# Altium PCB EVB-2.PCBDOC (part 1 of 6)
Units mil, origin at the board's own origin, x right, y up, seen from the top; angles counter-clockwise.
Board outline 2401.57 x 1771.65 mil, 6 copper layers (Top, Mid1-H, Mid2-PWR, GND, Mid3-V, Bottom), stack 59.449 mil thick; 172 components, 166 nets, 823 pads, 550 vias.
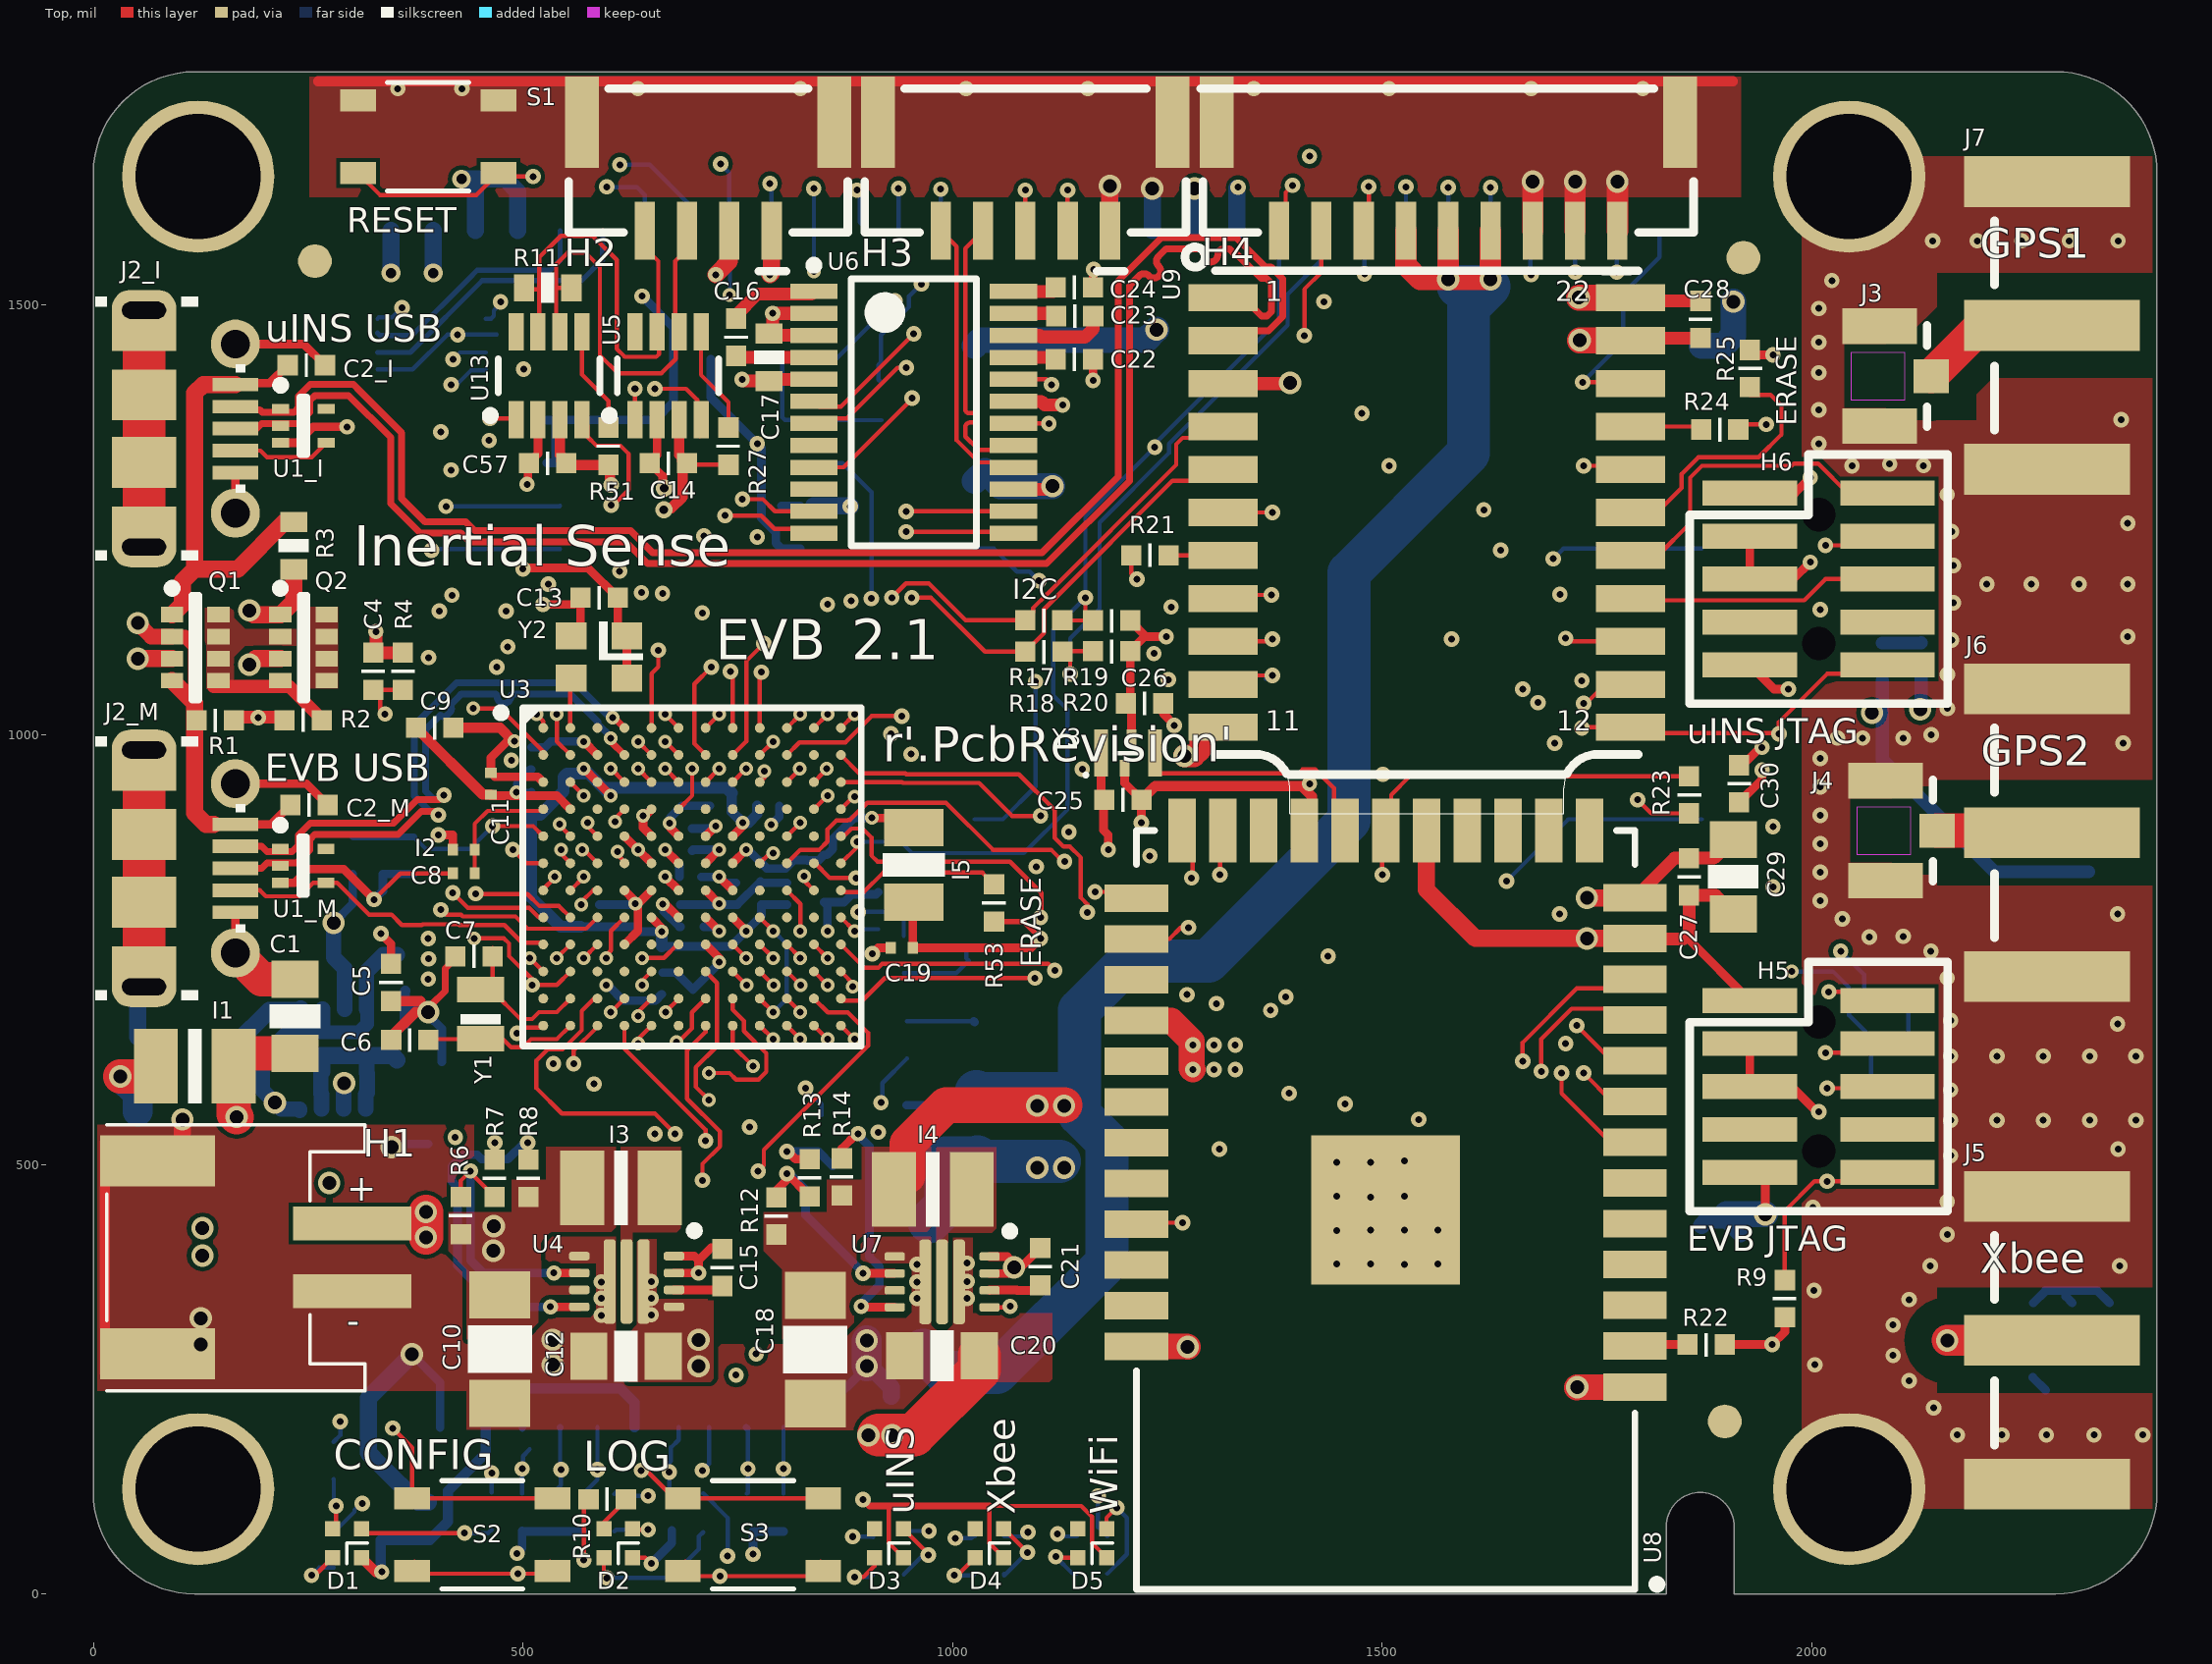
[diagram p0: Top view]
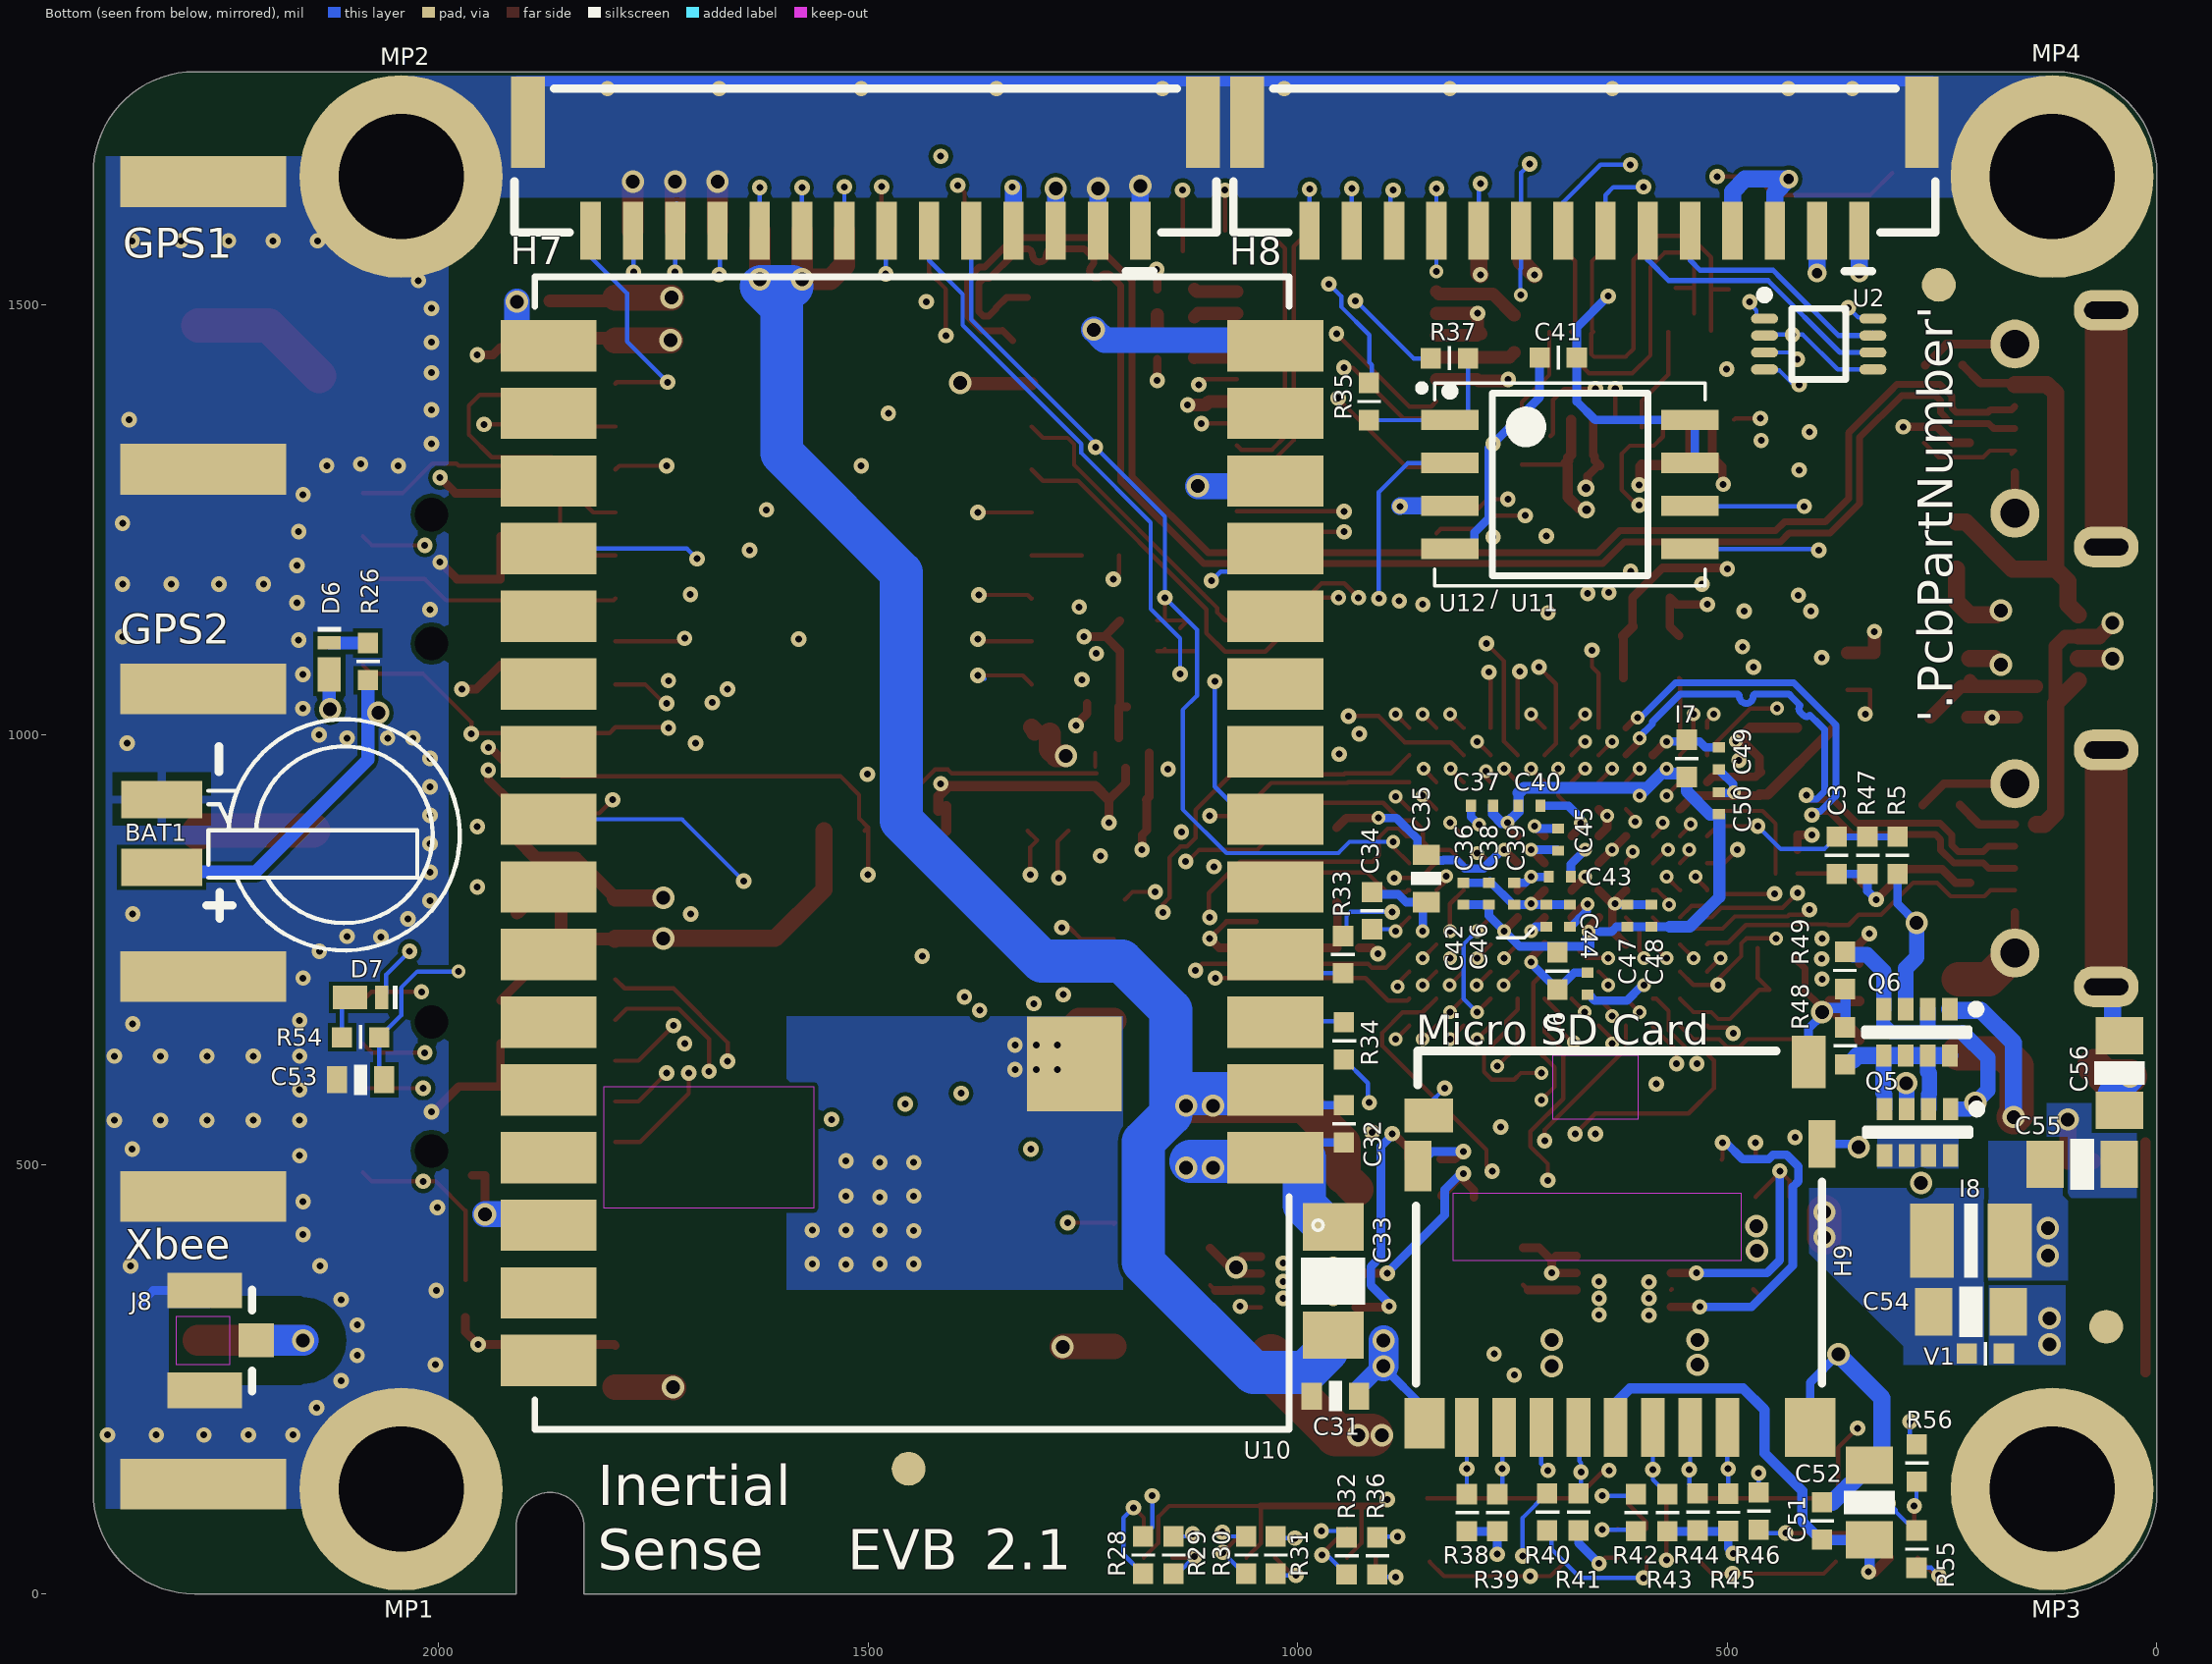
[diagram p1: Bottom view, seen from below]
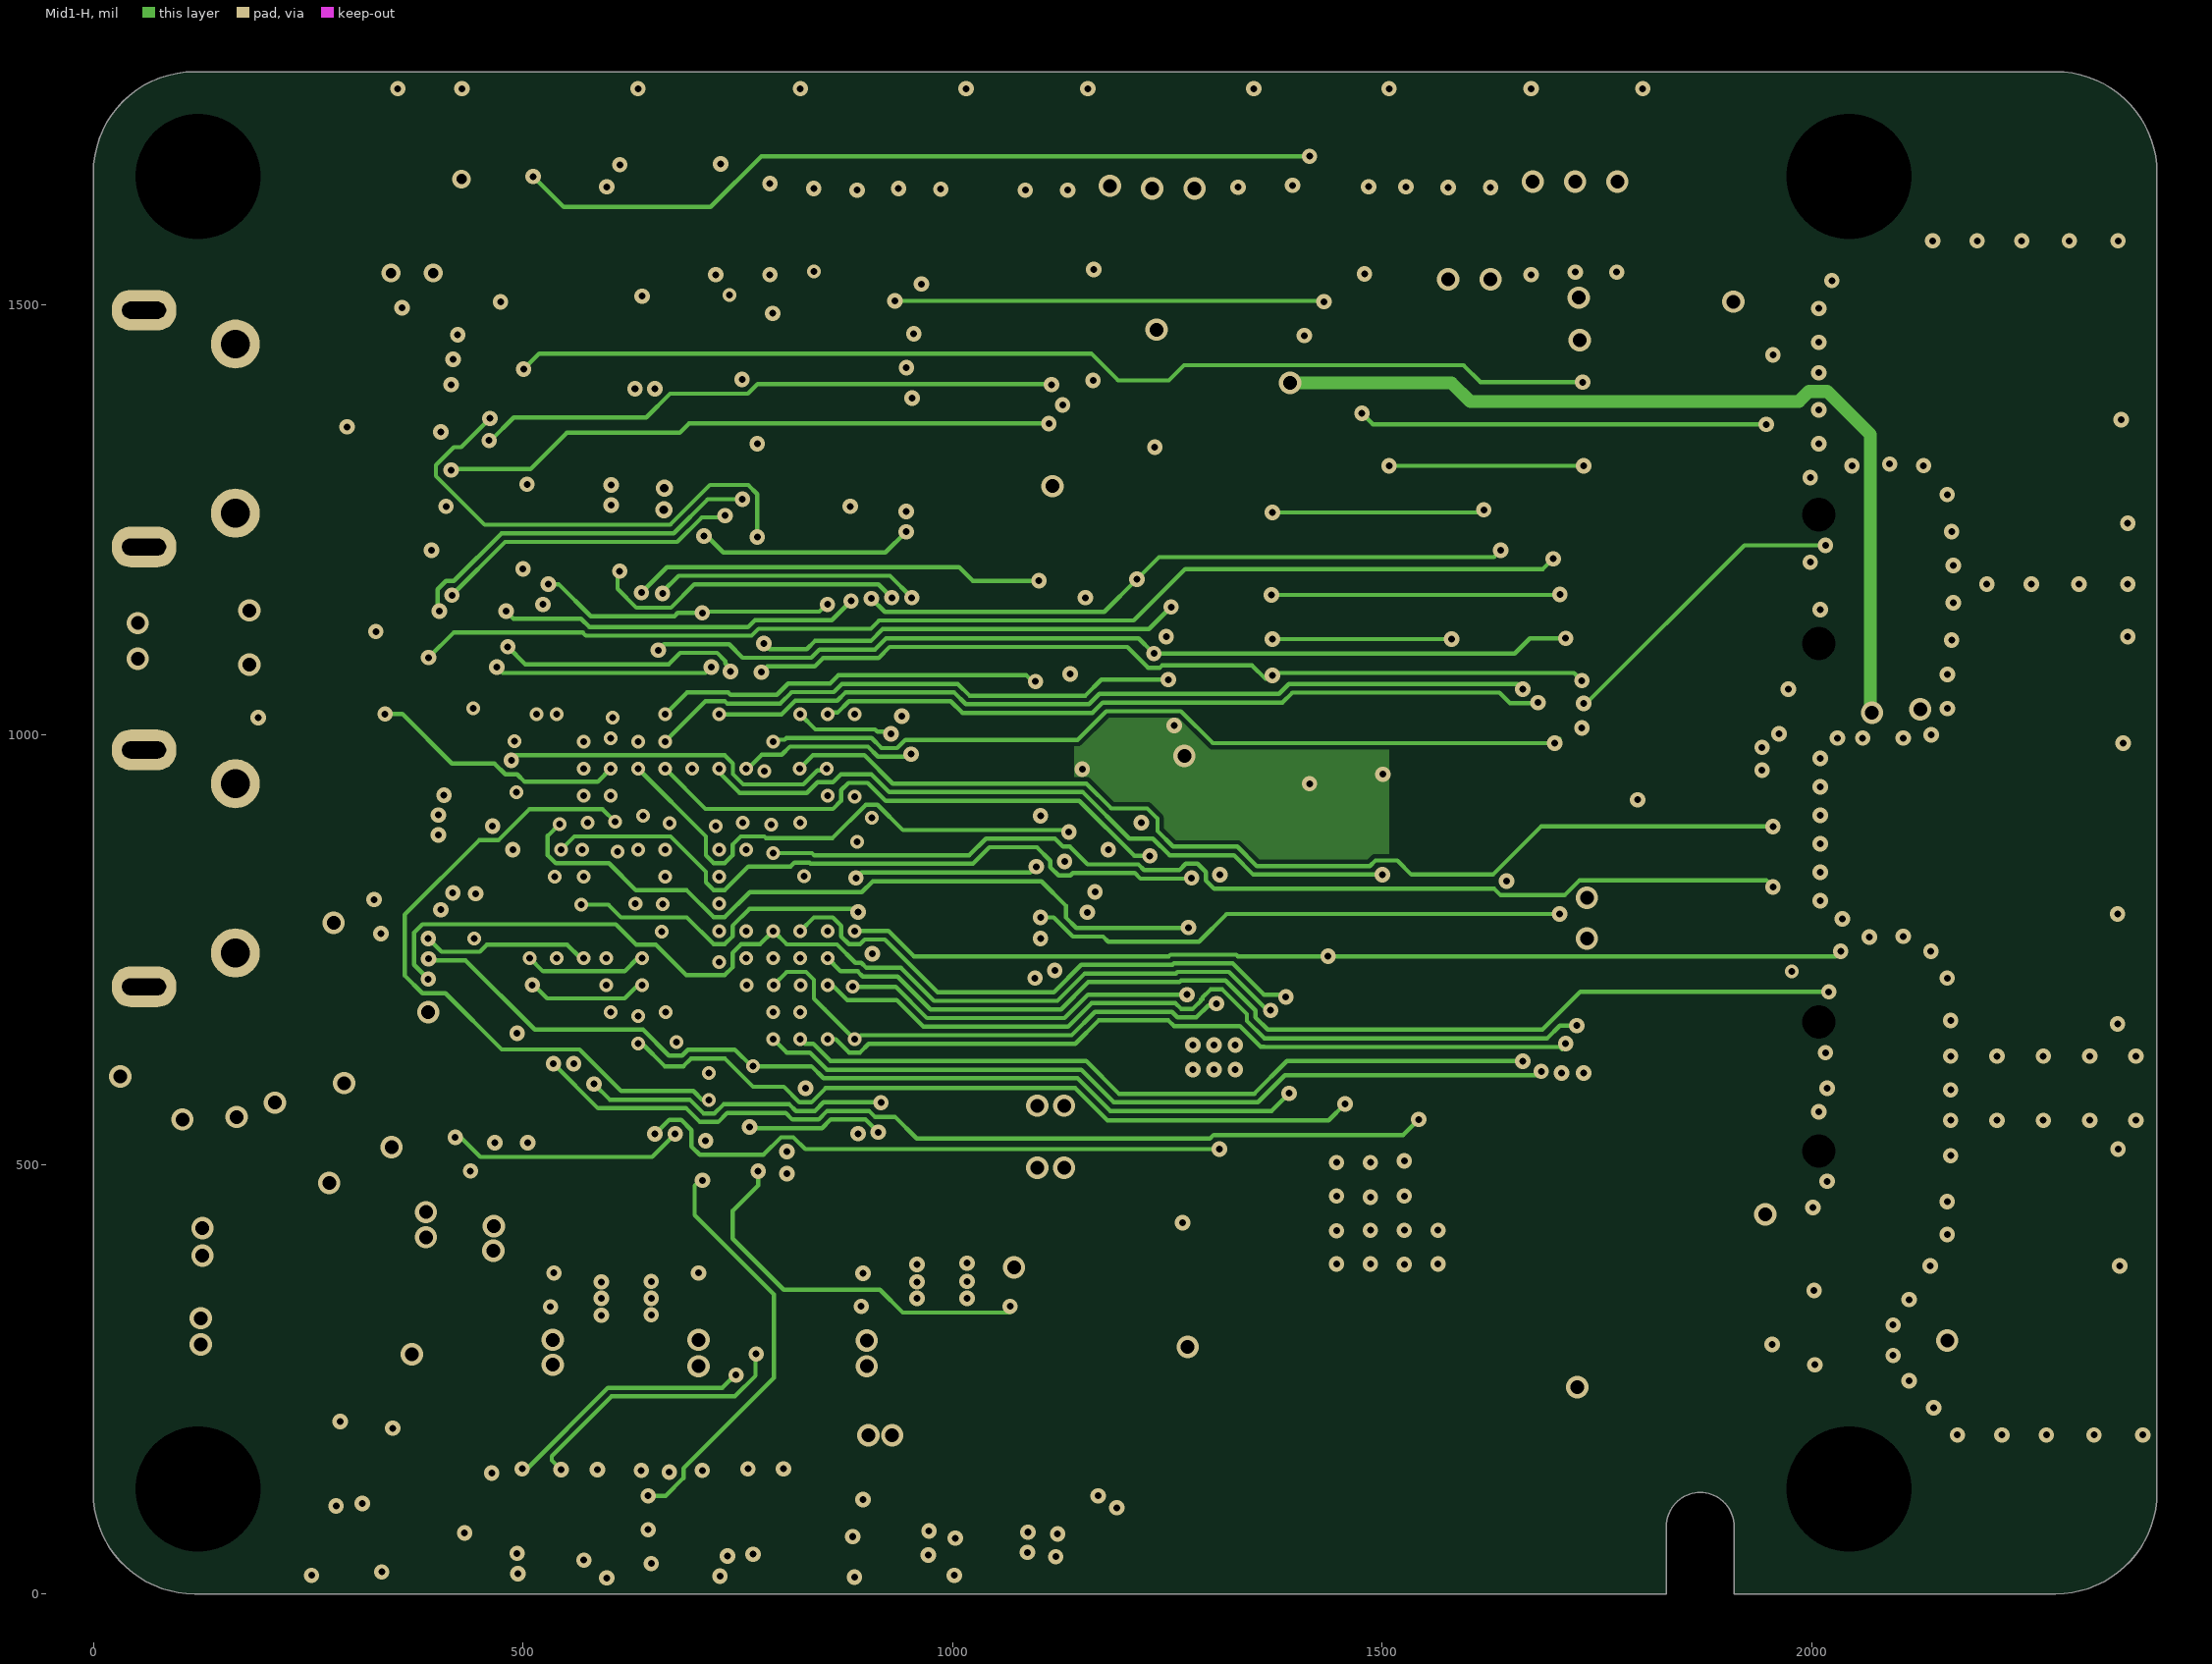
[diagram p2: Mid1-H]
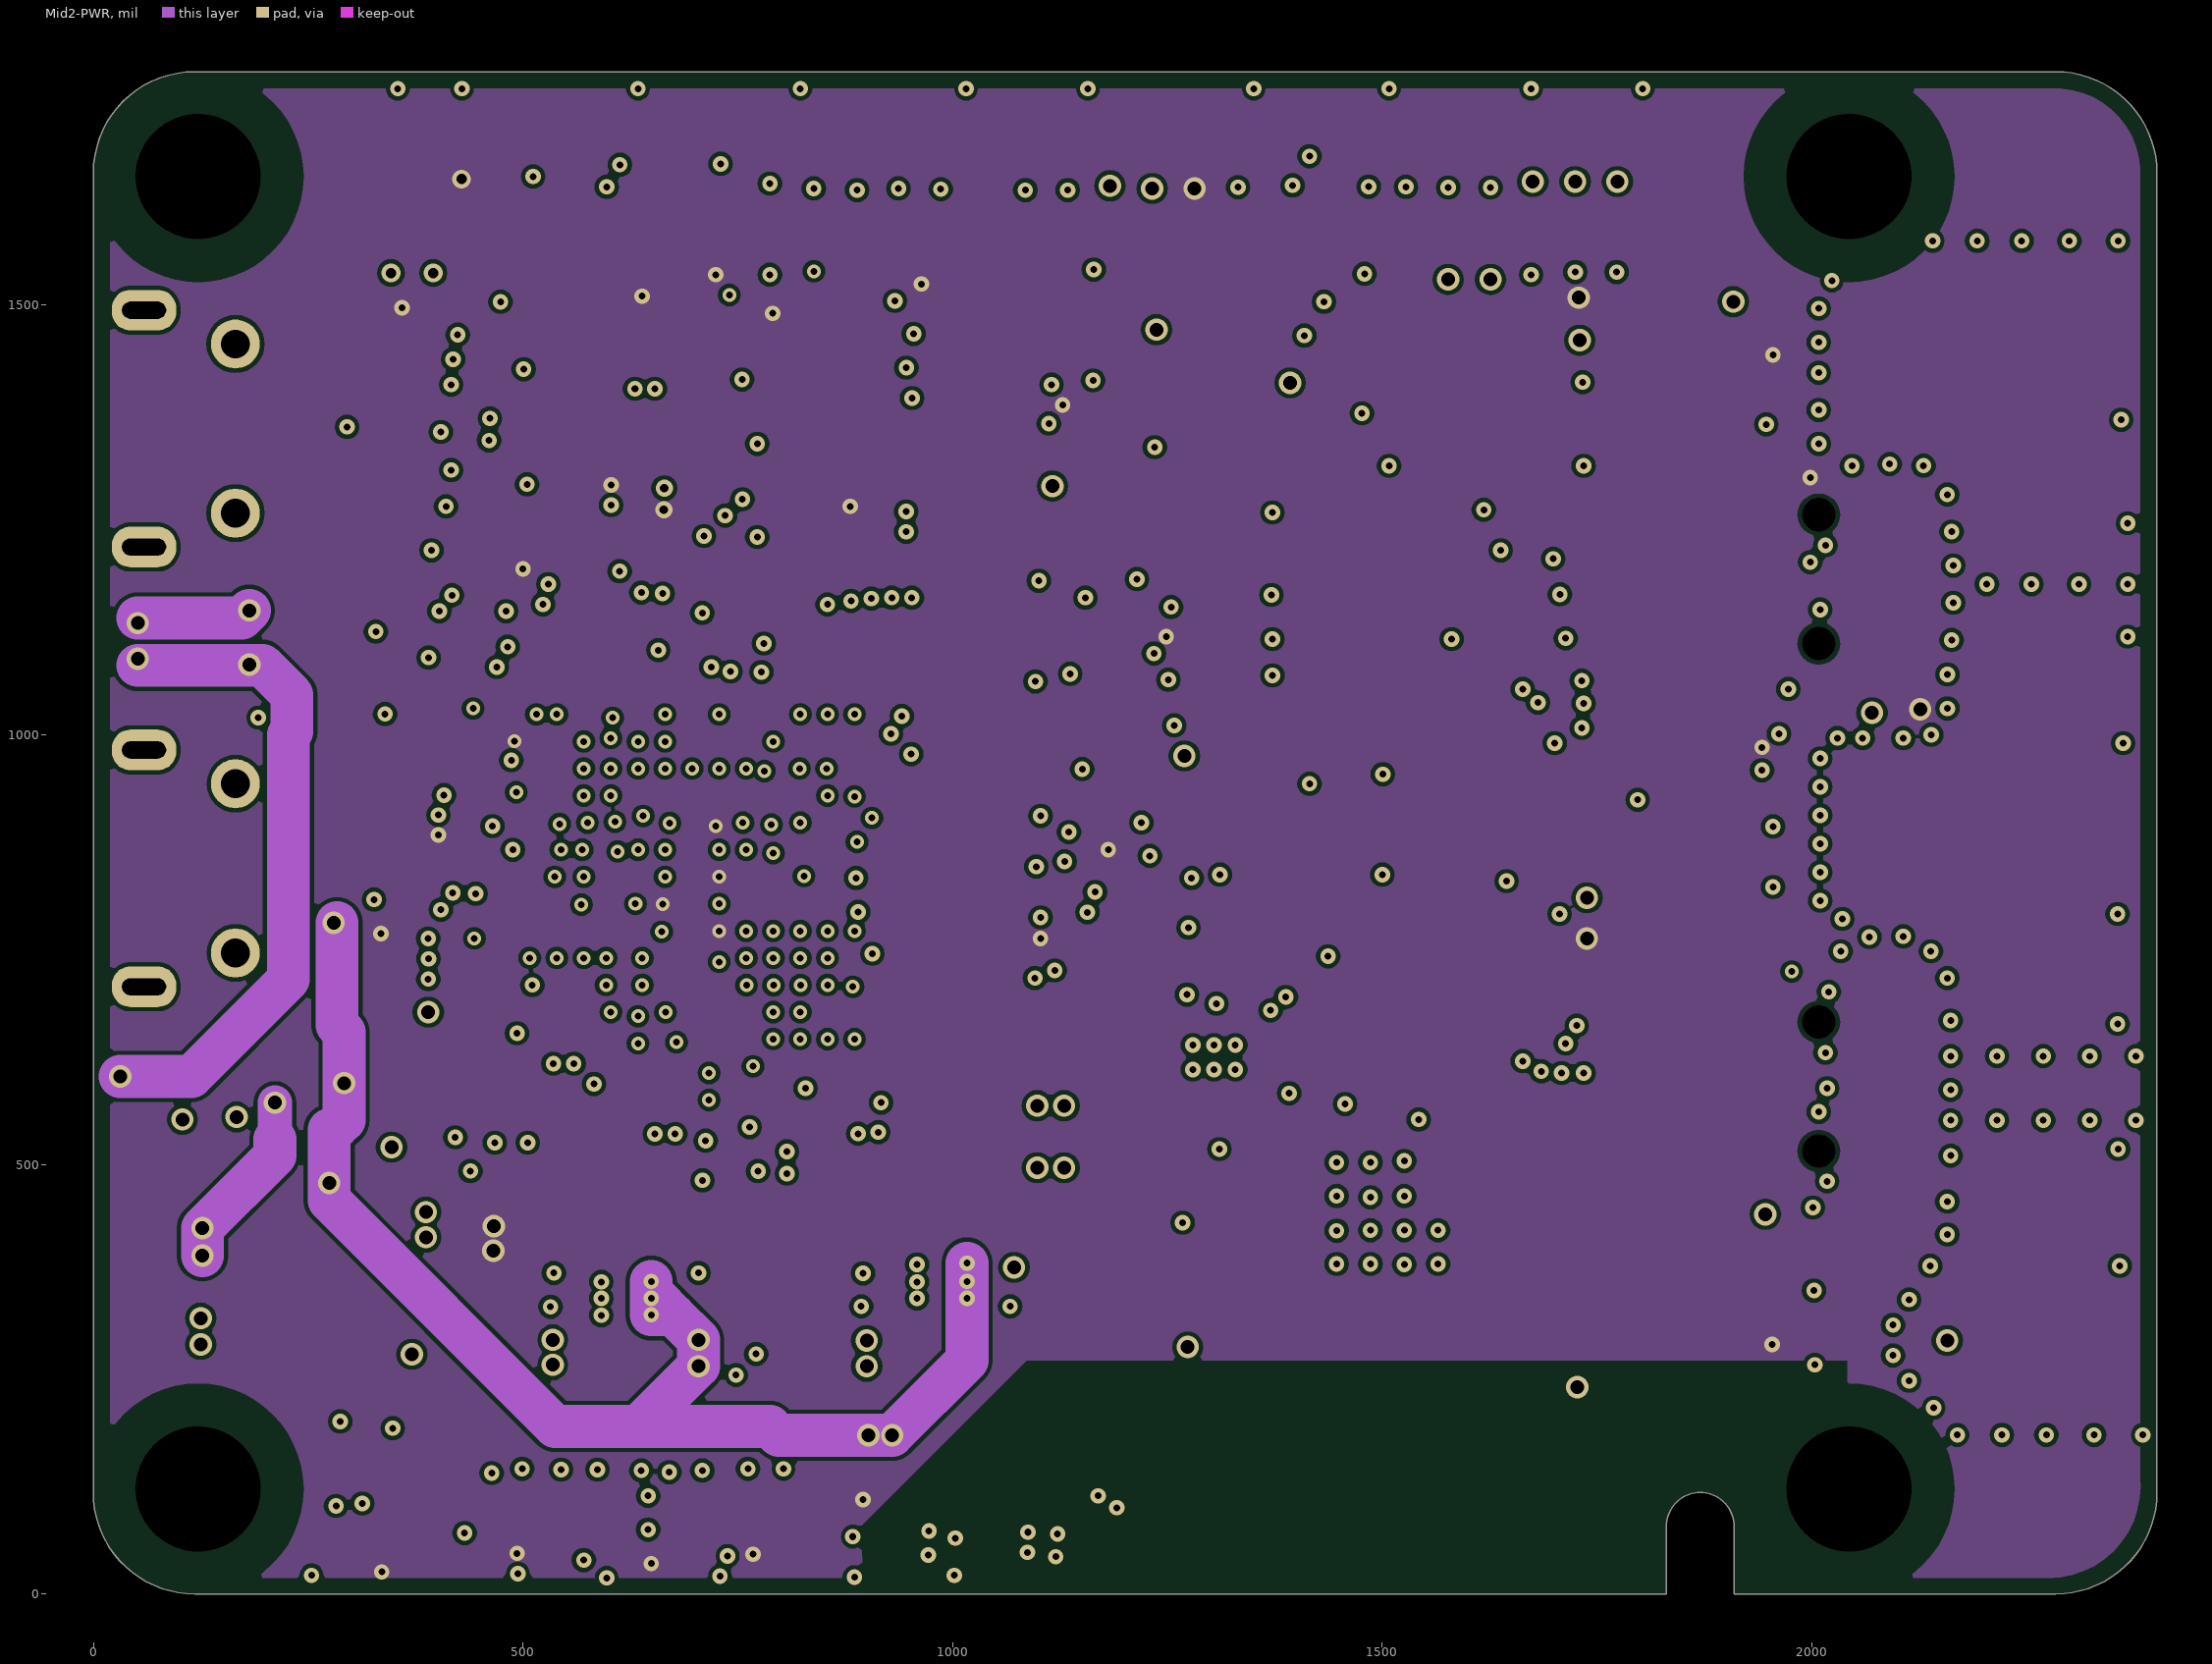
[diagram p3: Mid2-PWR]
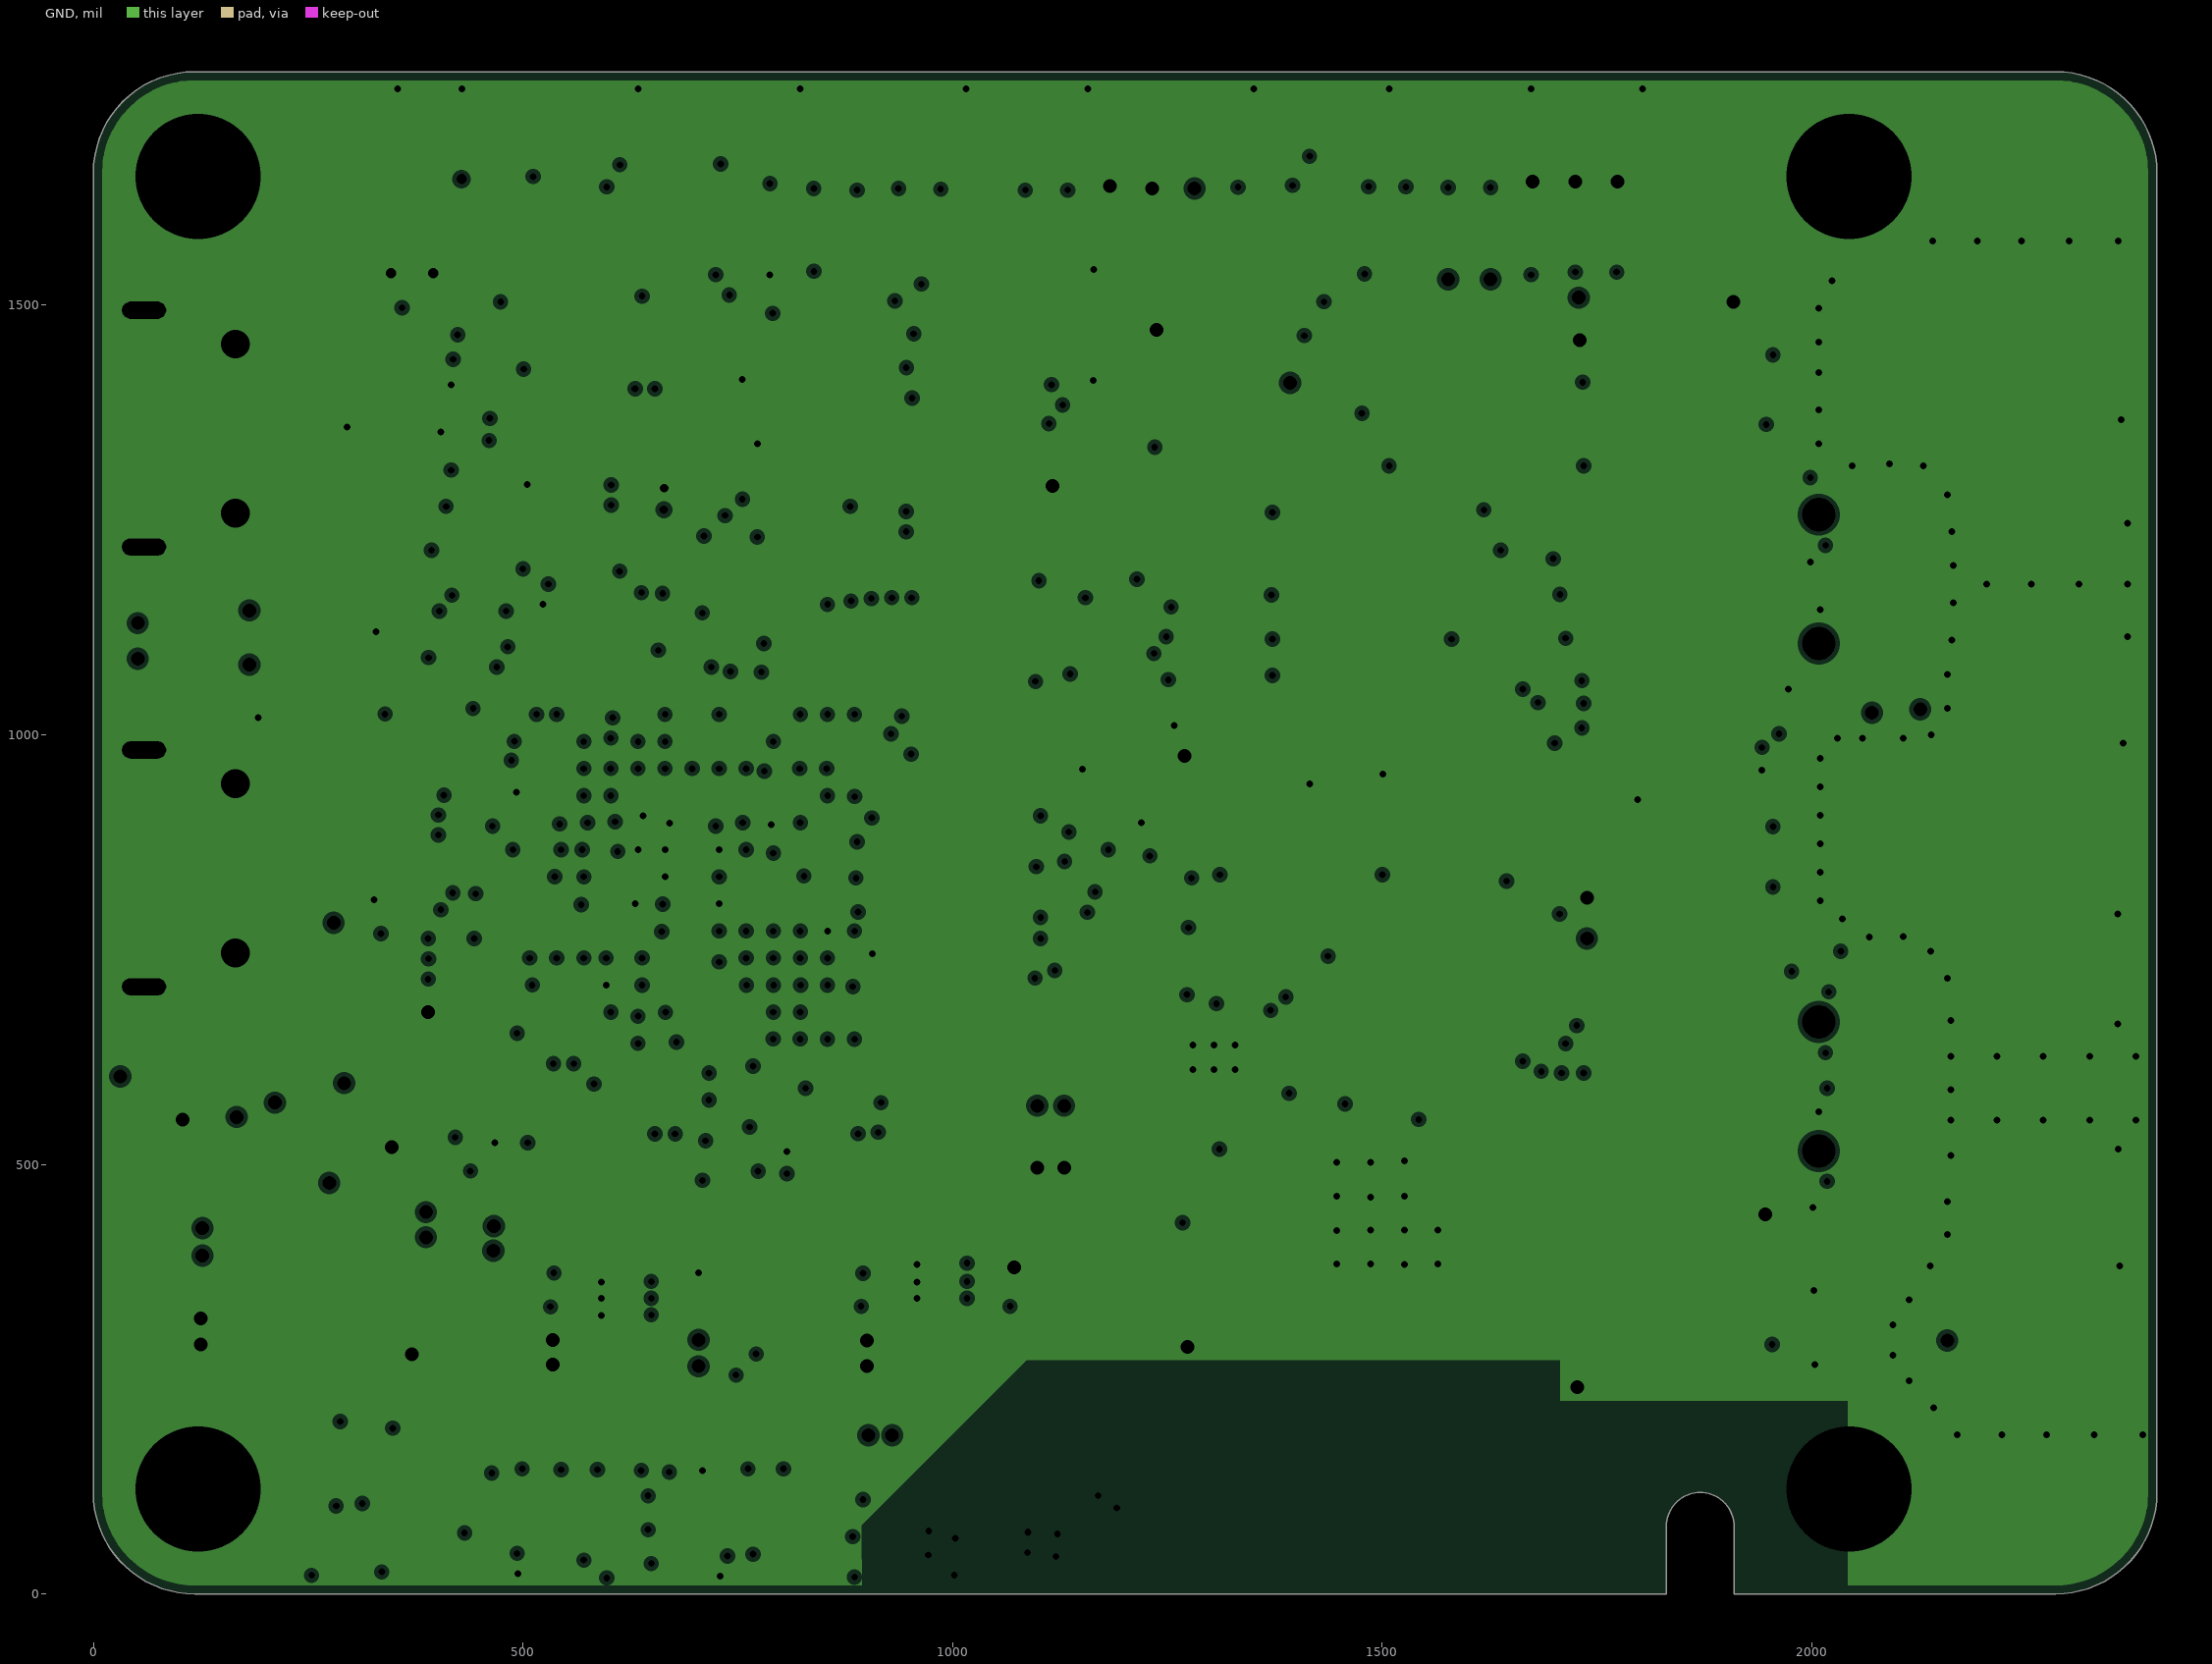
[diagram p4: GND, clearances drawn from the general rule]
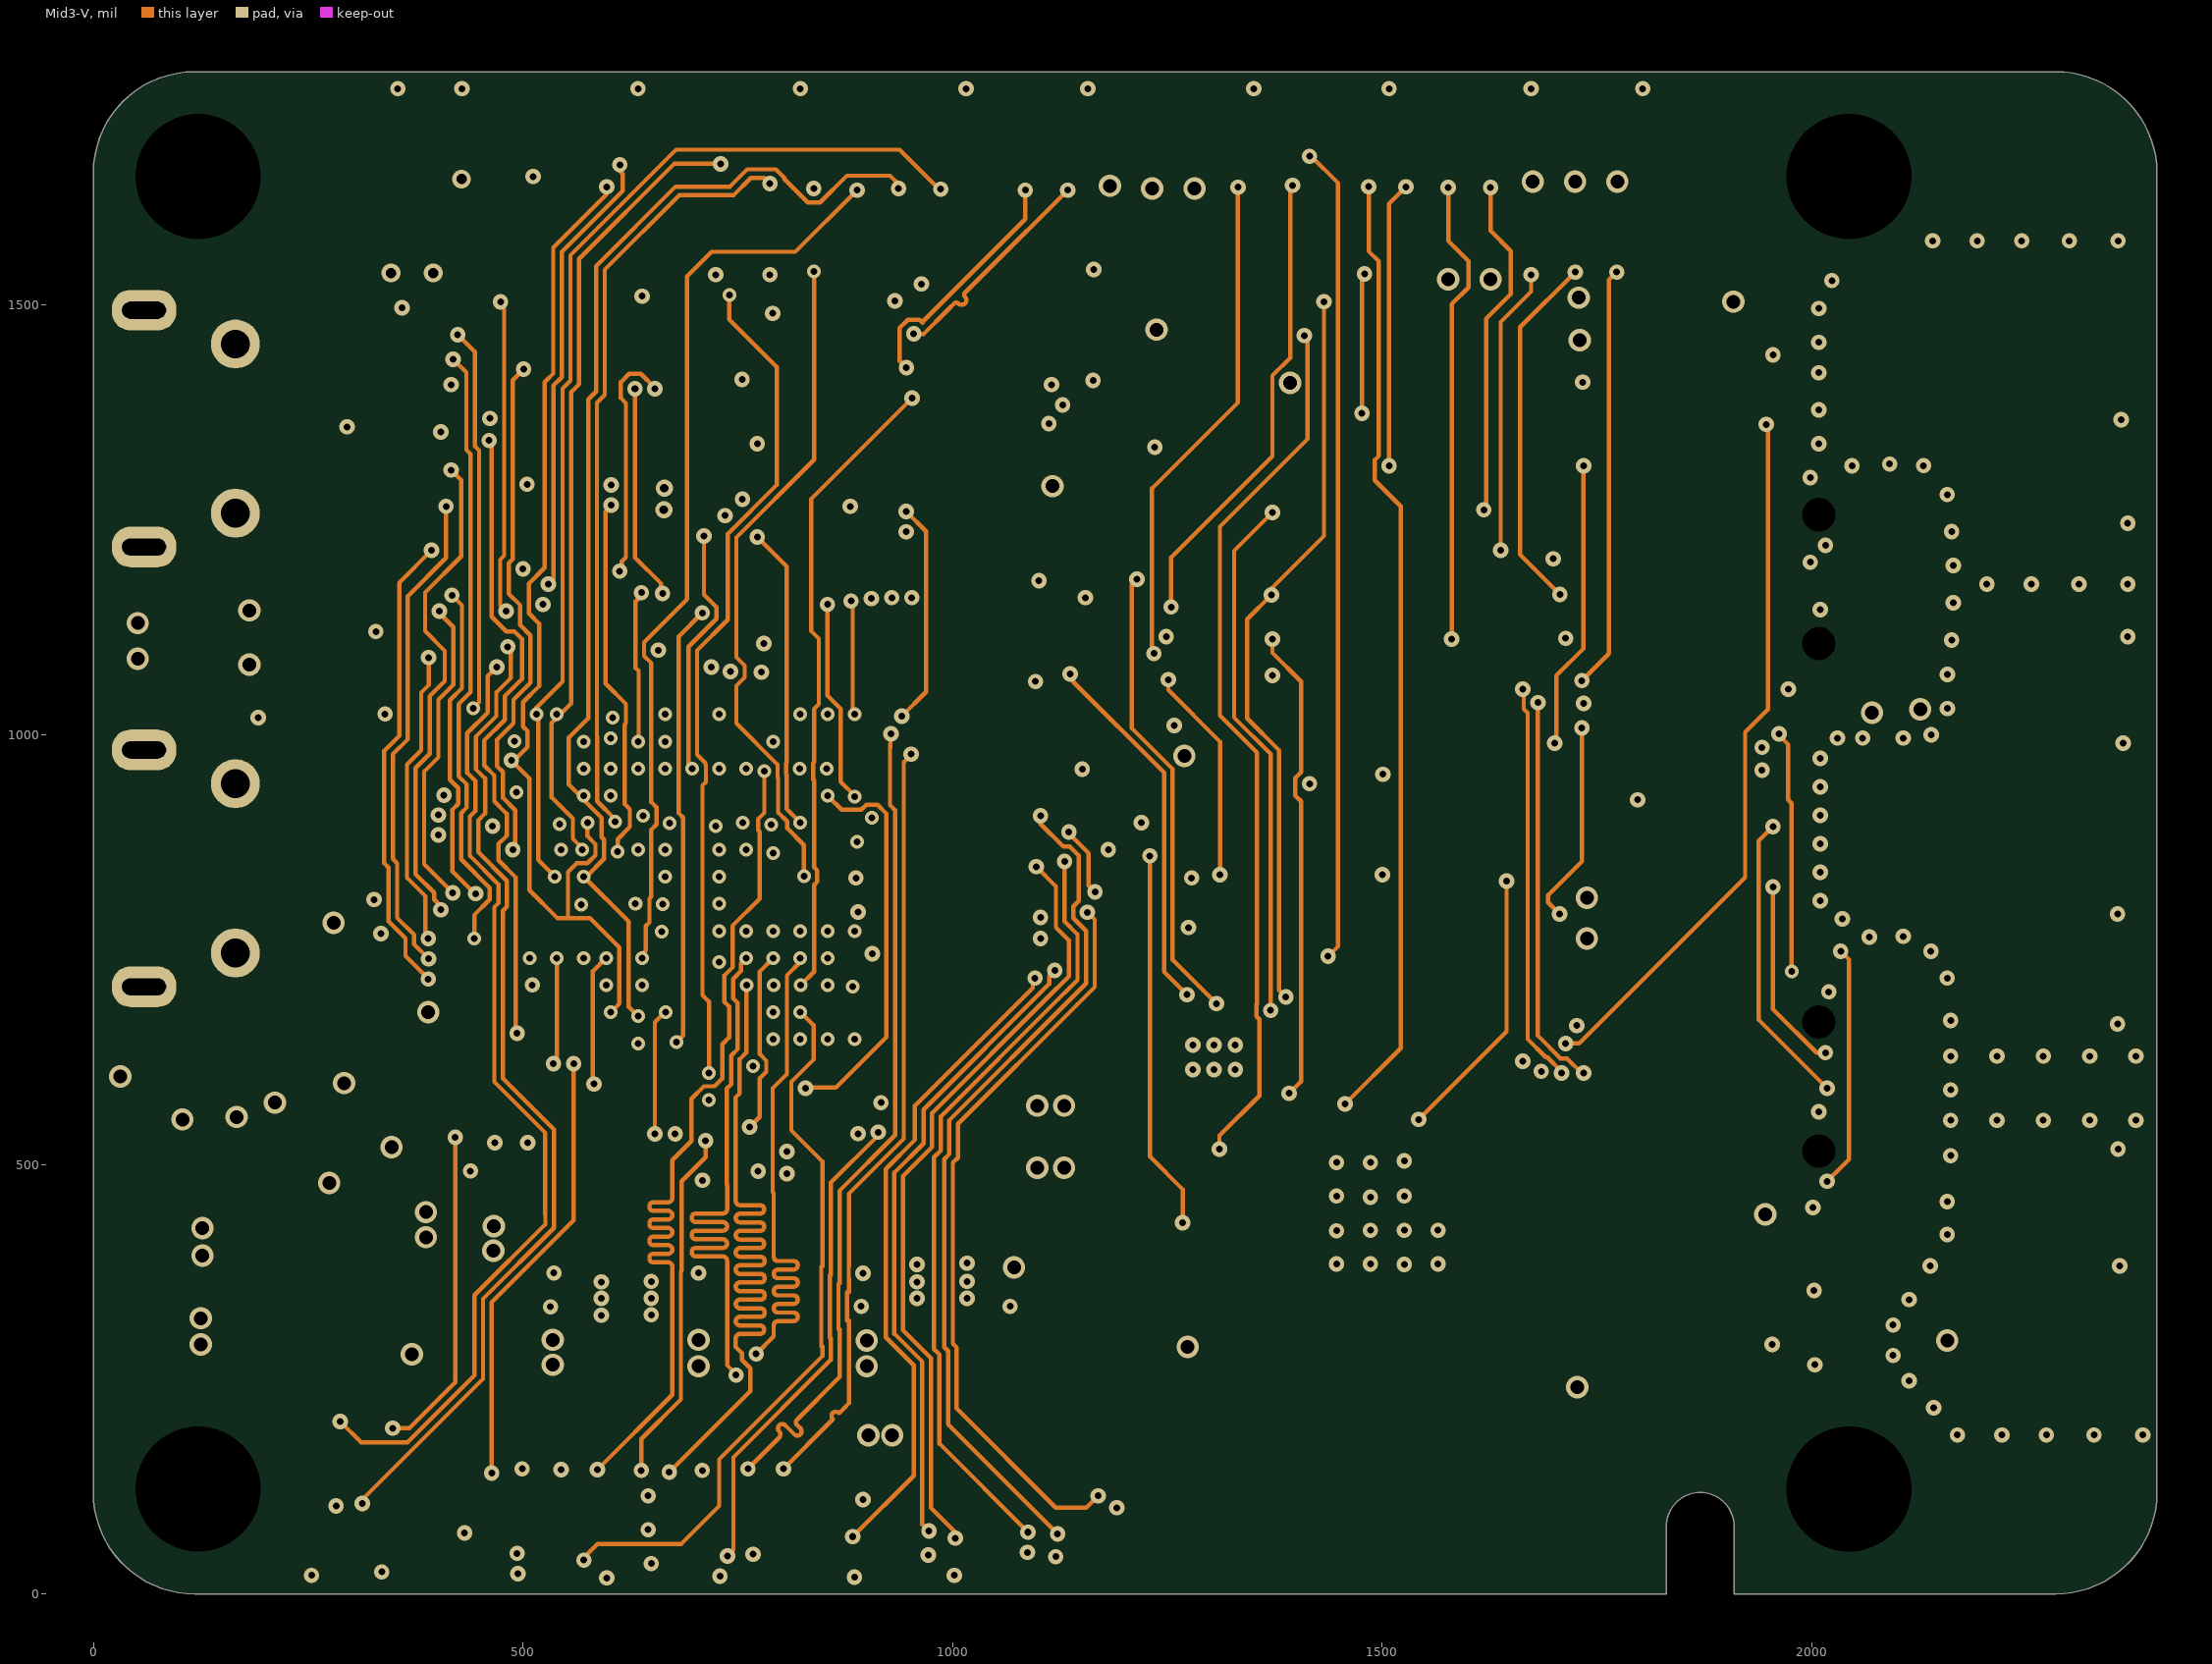
[diagram p5: Mid3-V]
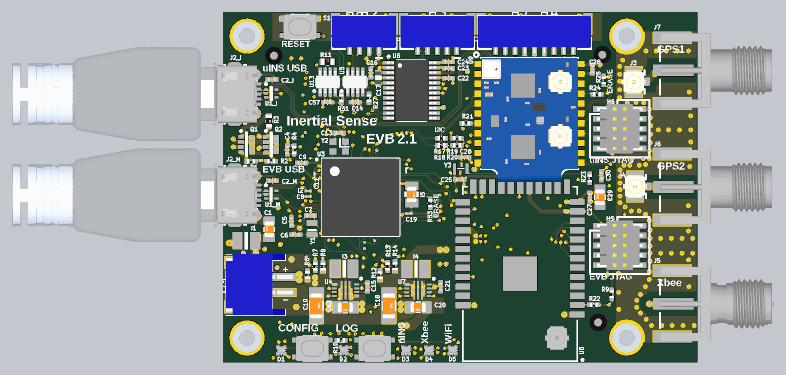
[diagram p9: 3D render of the assembled board from above, using the file's embedded part models]
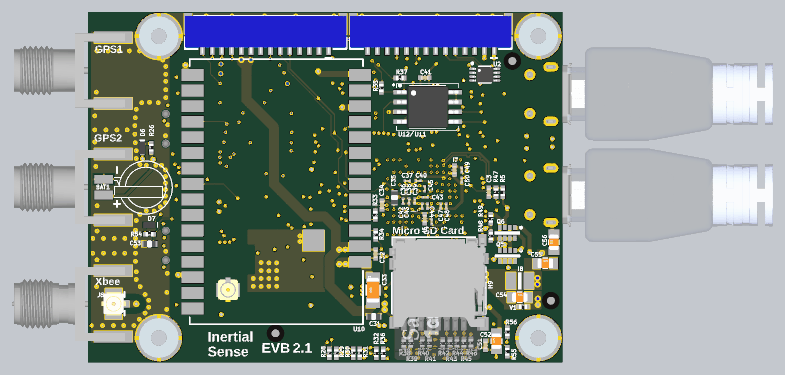
[diagram p10: 3D render of the assembled board from below, using the file's embedded part models]

## Layer stack, top to bottom
Solder Mask Top: solder mask 0.4, Solder Resist, Dk 3.5
Top: signal copper 1.378
Dielectric 4: dielectric 7.874, Dk 4.2
Mid1-H: signal copper 1.378
Dielectric1: core 7.874, FR-4, Dk 4.3
Mid2-PWR: signal copper 1.378
Dielectric3: prepreg 19.685, FR-4, Dk 4.3
GND: plane copper 1.378, net GND
Dielectric 5: core 7.874, Dk 4.2
Mid3-V: signal copper 1.378
Dielectric2: prepreg 7.874, FR-4, Dk 4.2
Bottom: signal copper 1.378
Solder Mask Bottom: solder mask 0.4, Solder Resist, Dk 3.5

## Board outline
1909.45,0 1909.45,78.74 ccw(c1870.09,78.75) 1870.08,118.11 ccw(c1870.06,78.76) 1830.71,78.74 1830.71,0 118.11,0 cw(c118.11,118.11) 0,118.11 0,1653.54 cw(c118.11,1653.54) 118.11,1771.65 2283.46,1771.65 cw(c2283.47,1653.55) 2401.57,1653.54 2401.57,118.11 cw(c2283.48,118.1) 2283.46,0

## Design rules (kind name [scope] priority, off if disabled: settings)
AssemblyTestPointUsage [All] p1 off:
AssemblyTestpoint [All] p1 off: testpointundercomponent=TRUE minsize=40 maxsize=100 preferedsize=60 minholesize=0 maxholesize=40 preferedholesize=32 testpointgrid=1 usegrid=TRUE gridtolerance=0.01 allowsidetop=TRUE allowsidebottom=TRUE
Clearance MountingHoles [(InPadClass('Mounting Holes'))] p1: gap=5 ignorepadtopadclearanceinfootprint=TRUE except(25: THPad-Hole; 50: Arc-Hole Track-Hole SMDPad-Hole Via-Hole Fill-Hole Poly-Hole Region-Hole Text-Hole)
Clearance "Clearance - GPS Ant" [InNetClass('RF_GPS') vs InNet('GND')] p2: gap=8 ignorepadtopadclearanceinfootprint=FALSE except(32: Arc-Fill Arc-Poly Arc-Region Track-Fill Track-Poly Track-Region SMDPad-Fill SMDPad-Poly SMDPad-Region THPad-Fill THPad-Poly THPad-Region Via-Fill Via-Poly Via-Region Fill-Fill Fill-Poly Fill-Region Poly-Poly Poly-Region Region-Region)
Clearance [All] p3: gap=5 ignorepadtopadclearanceinfootprint=FALSE
ComponentClearance Ignore [InComponent('H7')] p1: gap=-500 collisioncheckmode=3 verticalgap=-500 showdistances=FALSE
ComponentClearance HeaderClearance [InComponent('H1')] p2: gap=10 collisioncheckmode=3 verticalgap=-10 showdistances=FALSE
ComponentClearance Default [All] p3: gap=10 collisioncheckmode=3 verticalgap=10 showdistances=FALSE
DiffPairsRouting CAN [InDifferentialPairClass('CAN')] p1: maxlimit=14 minlimit=10 mostfreqgap=14 toplayer_prefgap=10 toplayer_minwidth=5 toplayer_maxwidth=6 toplayer_prefwidth=5 midlayer1_mingap=14 midlayer1_minwidth=4 midlayer1_maxwidth=6 midlayer1_prefwidth=4 midlayer2_mingap=14 midlayer2_minwidth=4 midlayer2_maxwidth=6 midlayer2_prefwidth=4 midlayer3_mingap=14 midlayer3_minwidth=4 midlayer3_maxwidth=6 midlayer3_prefwidth=4 bottomlayer_prefgap=10 bottomlayer_minwidth=5 bottomlayer_maxwidth=6 bottomlayer_prefwidth=5 maxuncoupledlength=500
DiffPairsRouting USB [InDifferentialPairClass('USB')] p2: maxlimit=5 minlimit=5 mostfreqgap=5 toplayer_minwidth=8 toplayer_maxwidth=8 toplayer_prefwidth=8 midlayer1_minwidth=8 midlayer1_maxwidth=8 midlayer1_prefwidth=8 midlayer2_minwidth=8 midlayer2_maxwidth=8 midlayer2_prefwidth=8 midlayer3_minwidth=8 midlayer3_maxwidth=8 midlayer3_prefwidth=8 bottomlayer_minwidth=8 bottomlayer_maxwidth=8 bottomlayer_prefwidth=8 maxuncoupledlength=500
DiffPairsRouting [All] p3: maxlimit=8 minlimit=8 mostfreqgap=8 toplayer_minwidth=8 toplayer_maxwidth=15 toplayer_prefwidth=15 midlayer1_minwidth=8 midlayer1_maxwidth=15 midlayer1_prefwidth=15 midlayer2_minwidth=8 midlayer2_maxwidth=15 midlayer2_prefwidth=15 midlayer3_minwidth=8 midlayer3_maxwidth=15 midlayer3_prefwidth=15 bottomlayer_minwidth=8 bottomlayer_maxwidth=15 bottomlayer_prefwidth=15 maxuncoupledlength=500
FabricationTestPointUsage [All] p1 off: valid=0 allowmultiple=FALSE
FabricationTestpoint [All] p1 off: side=3 testpointundercomponent=TRUE minsize=40 maxsize=100 preferedsize=60 minholesize=0 maxholesize=40 preferedholesize=32 testpointgrid=1 allowsidetop=TRUE allowsidebottom=TRUE usegrid=TRUE gridtolerance=0.01
HoleSize [All] p1: absolutevalues=TRUE maxlimit=200 minlimit=8 maxpercent=80.000 minpercent=20.000
HoleToHoleClearance [All] p1: gap=9 allowstackedmicrovias=TRUE
MatchedLengths MatchedLengths_HDMI [InDifferentialPairClass('HDMI')] p1: tolerance=5 checknetsindiffpair=TRUE checkdiffpairvsdiffpair=FALSE checkxsignals=FALSE checkothers=FALSE
MaxMinImpedance [InDifferentialPairClass('HDMI')] p1: minimum=10.00 maximum=110.0
MinimumAnnularRing [All] p1: minimumring=4
MinimumSolderMaskSliver MinimumSolderMaskSliver_Tight [HasFootprint('QFN40P300X300X105_HS-25L') OR HasFootprint('R0201x4') OR HasFootprint('R0201x2') OR HasFootprint('QFN50P300X200X60_HS-9L') OR HasFootprint('TSST8') OR HasFootprint('SOT23-8-65P280X145-8N') OR HasFootprint('TSOP65P640X120-24N') OR HasFootprint('SOTFL50P160X60-5N')] p1: minsoldermaskwidth=1
MinimumSolderMaskSliver [All] p2: minsoldermaskwidth=3
PlaneClearance [All] p1: clearance=5
PlaneConnect "Power Plane Connect Style" [All] p1: planeconnectstyle=Direct reliefexpansion=20 reliefentries=4 reliefconductorwidth=7 reliefairgap=10
PolygonConnect "Direct Connect" [InPolygonClass('NO THERMALS')] p1: connectstyle=Direct reliefconductorwidth=10 reliefentries=4 polygonreliefangle="90 Angle" airgapwidth=10
PolygonConnect "GND Vias" [InNet('GND') AND IsVia] p2: connectstyle=Direct reliefconductorwidth=10 reliefentries=4 polygonreliefangle="90 Angle" airgapwidth=10
PolygonConnect "Default Polygon Connect" [All] p3: connectstyle=Relief reliefconductorwidth=10 reliefentries=4 polygonreliefangle="90 Angle" airgapwidth=10
RoutingCorners "Routing Corners Default" [All] p1: cornerstyle=45-Degree minsetback=100 maxsetback=100
RoutingLayers "Routing Layers Default" [All] p1: top layer_v5=TRUE mid layer 1_v5=TRUE mid layer 2_v5=TRUE mid layer 3_v5=TRUE bottom layer_v5=TRUE
RoutingPriority "Routing Priority Default" [All] p1: routingpriority=0
RoutingVias "Via Style Default" [All] p1: holewidth=8 width=18 viastyle="Through Hole" minholewidth=8 minwidth=16 maxholewidth=25 maxwidth=35
SilkToBoardRegionClearance [All] p1 off:
SilkToSilkClearance [Not ( ((ObjectKind = 'Text') And ((UseInvertedRectangle = 'True') OR (IsTextInverted = 'True'))) OR (ObjectKind = 'Fill') ) vs Not ( ((ObjectKind = 'Text') And ((UseInvertedRectangle = 'True') OR (IsTextInverted = 'True'))) OR (ObjectKind = 'Fill') )] p1: silktosilkclearance=3
SilkToSolderMaskClearance SilkscreenOverComponentPads [NOT(IsPad AND OnLayer('Multi-Layer'))] p1: minsilkscreentomaskgap=0 clearancetoexposedcopper=TRUE
SolderMaskExpansion Tented [IsVia AND (InNet('VIN') OR InNet('VINP') OR InNet('+3.3V'))] p1: expansion=-30 istentingtop=FALSE
SolderMaskExpansion "SolderMaskExpansion GND Vias" [IsVia AND InNet('GND')] p2: expansion=-30 istentingtop=FALSE
SolderMaskExpansion "SolderMaskExpansion Vias" [IsVia] p3: expansion=-30 istentingtop=FALSE
SolderMaskExpansion "Solder Mask Expansion" [All] p4: expansion=3 istentingtop=FALSE
Width "RF GPS" [InNetClass('RF_GPS')] p1: maxlimit=40 minlimit=10 preferedwidth=14
Width "Width Default" [All] p2: maxlimit=150 minlimit=3 preferedwidth=5
13 further rules are at their usual default settings.

## Classes and differential pairs
net class "Mounting Holes": GND
net class SD_BUS: SD.CLK SD.CMD SD.D0 SD.D1 SD.D2 SD.D3
channel class CON-USB: I M
component class M: C2_M J2_M U1_M
component class I: C2_I J2_I U1_I
differential pair class USB: I-USB.D M-USB.D
component class U_SD-Card: C51 C52 H9 R38 R39 R41 R43 R44 R45
component class U_SAM70: C4 C5 C6 C7 C8 C9 C11 C13 C19 C26 C30 C34 C35 C36 C37 C38 C39 C40 C42 C43 C44 C45 C46 C47 C48 C49 C50 C53 D1 D2 D3 D4 D5 D7 H4 H5 H8 I2 I5 I6 I7 R4 R9 R10 R28 R29 R30 R31 R32 R36 R40 R42 R46 R53 R54 R55 R56 S1 S2 S3 U2 U3 Y1 Y2
component class U_RS232-485: C16 C17 C22 C23 C24 H3 U6
component class U_RF: J3 J4 J5 J6 J7 J8
differential pair class CAN: CAN.D
component class U_WiFi: C25 C27 C29 R22 R23 U8 Y3
component class U_CAN: C14 C57 H2 R11 R27 R51 U5 U13
net class RF_GPS: BEE_ANT GPS1_ANT GPS2_ANT
polygon class "NO THERMALS": Inner-INS.3V3 REG RF_BOT
pad class "Mounting Holes": MP1-1 MP2-1 MP3-1 MP4-1
differential pair M-USB.D: +M-USB.D_P -M-USB.D_N
differential pair I-USB.D: +I-USB.D_P -I-USB.D_N
differential pair CAN.D: +CAN.D_P -CAN.D_N

## Components (designator, comment, footprint, x,y, rotation, side; value= is the part's Value field where it differs from the comment)
BAT1 "Battery" ML614S 2322.05,885 r270 bottom locked
C1 "Cap" 0805 234.74,672.28 r90 top value=10uF
C2_I "Cap" 0402 247.89,1430.12 r0 top value=0.1uF (schematic designator C2)
C2_M "Cap" 0402 250.98,918.17 r0 top value=0.1uF (schematic designator C2)
C3 "Cap" 0402 372.85,859.58 r270 bottom value=220nF
C4 "Cap" 0402 325.79,1073.82 r90 top value=10pF
C5 "Cap" 0402 346.46,711.61 r90 top value=0.1uF
C6 "Cap" 0402 368.29,644.68 r180 top value=15pF
C7 "Cap" 0402 442.91,742.13 r180 top value=15pF
C8 "Cap" 0201 431.1,838.58 r180 top value=0.1uF
C9 "Cap" 0402 397.32,1008.09 r0 top value=0.1uF
C10 "Cap" 1206 473.05,284.94 r270 top value=22uF
C11 "Cap" 0201 462.6,942.91 r270 top value=0.1uF
C12 "Cap" 0805 620,276.67 r180 top value=10uF
C13 "Cap" 0402 588.58,1159.45 r0 top value=0.1uF
C14 "Cap" 0402 669.29,1315.94 r0 top value=0.1uF
C15 "Cap" 0402 731.9,380 r90 top value=3300pF
C16 "Cap" 0402 748.03,1462.6 r90 top value=0.1uF
C17 "Cap" 0603 786.42,1439.18 r270 top value=1uF
C18 "Cap" 1206 840.17,284.45 r270 top value=22uF
C19 "Cap" 0201 940.94,751.97 r180 top value=0.1uF
C20 "Cap" 0805 987.81,277.33 r180 top value=10uF
C21 "Cap" 0402 1101.98,380.91 r90 top value=3300pF
C22 "Cap" 0402 1141.73,1437.01 r180 top value=0.1uF
C23 "Cap" 0402 1142.02,1487.2 r180 top value=0.1uF
C24 "Cap" 0402 1141.73,1520.67 r180 top value=0.1uF
C25 "Cap" 0402 1198.15,924.21 r180 top value=0.1uF
C26 "Cap" 0402 1223.41,1036.42 r180 top value=0.1uF
C27 "Cap" 0402 1857.05,834.65 r270 top value=0.1uF
C28 "Cap" 0402 1870.39,1483.27 r90 top value=0.1uF
C29 "Cap" 0805 1908.46,834.64 r90 top value=10uF
C30 "Cap" 0402 1915.35,942.91 r90 top value=0.1uF
C31 "Cap" 0603 956.06,230.32 r180 bottom value=1uF
C32 "Cap" 0402 946.17,547.24 r270 bottom value=0.1uF
C33 "Cap" 1206 958.66,364.17 r90 bottom value=22uF
C34 "Cap" 0402 913.38,795.28 r90 bottom value=47nF
C35 "Cap" 0603 850.39,832.68 r270 bottom
C36 "Cap" 0201 807.09,814.96 r90 bottom value=0.1uF
C37 "Cap" 0201 785.43,917.32 r0 bottom value=0.1uF
C38 "Cap" 0201 777.56,814.96 r90 bottom value=0.1uF
C39 "Cap" 0201 748.03,814.96 r270 bottom value=0.1uF
C40 "Cap" 0201 730.31,917.32 r180 bottom value=0.1uF
C41 "Cap" 0402 696.85,1438.98 r180 bottom value=0.1uF
C42 "Cap" 0201 710.63,789.37 r90 bottom value=0.1uF
C43 "Cap" 0201 694.88,834.65 r180 bottom value=0.1uF
C44 "Cap" 0201 662.64,710.37 r270 bottom value=0.1uF
C45 "Cap" 0201 696.85,877.95 r270 bottom value=0.1uF
C46 "Cap" 0201 683.07,789.37 r90 bottom value=0.1uF
C47 "Cap" 0201 616.14,789.37 r90 bottom value=0.1uF
C48 "Cap" 0201 588.58,789.37 r90 bottom value=0.1uF
C49 "Cap" 0201 509.84,972.44 r270 bottom value=0.1uF
C50 "Cap" 0201 509.84,920.28 r90 bottom value=0.1uF
C51 "Cap" 0402 389.76,85 r270 bottom value=0.1uF
C52 "Cap" 0805 334.65,106.3 r90 bottom value=10uF
C53 "Cap" 0603 2090.55,598.43 r0 bottom
C54 "Cap" 0805 216.54,328.25 r180 bottom value=10uF
C55 "Cap" 0805 87.05,500 r180 bottom value=10uF
C56 "Cap" 0805 43.74,606.3 r90 bottom value=10uF
C57 "Cap" 0402 528.68,1315.94 r0 top value=0.1uF
D1 "LED-RGB" LED0404 295.28,59.06 r270 top
D2 "LED-RGB" LED0404 610.84,59.06 r270 top
D3 "LED-RGB" LED0404 925.9,59.05 r270 top
D4 "LED-RGB" LED0404 1042.93,59.05 r270 top
D5 "LED-RGB" LED0404 1162.4,59.06 r270 top
D6 "Diode - Schottky" D0603B 2127.05,1082.41 r270 bottom
D7 "Diode - Schottky" D0603B 2090.55,694.15 r0 bottom
H1 "Hdr - 2pin - mount" S2B-PH-SM4-TB(LF)(SN) 15.75,391.73 r270 top locked
H2 "Hdr - 4pin - mount" SM04B-GHS-TB(LF)(SN) 740.16,1765.75 r180 top locked
H3 "Hdr - 5pin - mount" SM05B-GHS-TB(LF)(SN) 1084.65,1765.75 r180 top locked
H4 "Hdr - 9pin - mount" SM09B-GHS-TB(LF)(SN) 1650.59,1765.75 r180 top locked
H5 "Hdr - 5x2pin" FTSH-105-01-L-DV-K-A-P 2007.87,590.55 r270 top locked
H6 "Hdr - 5x2pin" FTSH-105-01-L-DV-K-A-P 2007.87,1181.1 r270 top locked
H7 "Hdr - 14pin - mount" SM14B-GHS-TB(LF)(SN) 1502.95,1765.75 r0 bottom locked
H8 "Hdr - 14pin - mount" SM14B-GHS-TB(LF)(SN) 666.34,1765.75 r0 bottom locked
H9 "SD Card Socket" 114-00841-68 803.15,193.9 r180 bottom locked
I1 "Inductor" INDC2520X12N 118.11,614.17 r0 top value=1uH
I2 "Inductor" 0201 431.1,866.27 r180 top value="240 Ohm"
I3 "Inductor" INDC2520X12N 614.1,472.54 r180 top value=1uH
I4 "Inductor" INDC2520X12N 976.98,470.96 r180 top value=1uH
I5 "Inductor" 0806 954.72,848.43 r270 top
I6 "Inductor" 0402 697.84,725.07 r90 bottom value="470R @ 100MHz"
I7 "Inductor" 0402 547.25,972.44 r270 bottom value="470R @ 100MHz"
I8 "Inductor" INDC2520X12N 216.54,411.22 r0 bottom value=1uH
J2_I "USB-MICRO-B-STRONG" "USB Micro AB R/A THR - design" 59.06,1356.3 r270 top locked (schematic designator J2)
J2_M "USB-MICRO-B-STRONG" "USB Micro AB R/A THR - design" 59.06,844.49 r270 top locked (schematic designator J2)
J3 "RF - GND x 2" "RF UMC SMD" 2078.74,1417.32 r0 top
J4 "RF - GND x 2" "RF UMC SMD" 2085.63,888.35 r0 top
J5 "RF - GND x 4" "RF RPSMA End Launch" 2401.57,295.28 r270 top locked
J6 "RF - GND x 4" "RF SMA End Launch 2" 2401.57,885.83 r270 top locked
J7 "RF - GND x 4" "RF SMA End Launch 2" 2401.57,1476.38 r270 top locked
J8 "RF - GND x 2" "RF UMC SMD" 2272.05,295 r180 bottom
MP1 "Standoff" 9774050151R 2043.31,122.05 r180 bottom locked
MP2 "Standoff" 9774050151R 2043.31,1649.61 r180 bottom locked
MP3 "Standoff" 9774050151R 122.05,122.05 r180 bottom locked
MP4 "Standoff" 9774050151R 122.05,1649.61 r180 bottom locked
Q1 "MOSFET-P" TSST8 118.66,1101.38 r0 top
Q2 "MOSFET-P" TSST8 244.65,1101.38 r0 top
Q5 "MOSFET-P" TSST8 278.54,537.4 r270 bottom
Q6 "MOSFET-P" TSST8 279.53,653.54 r270 bottom
R1 "Res" R0402 142.05,1016.73 r0 top value=100K
R2 "Res" R0402 244.09,1016.73 r180 top value=100K
R3 "Res" R0603 233.11,1220 r270 top value=0
R4 "Res" R0402 360.24,1073.82 r90 top value=5.62K
R5 "Res" R0402 301.99,859.58 r270 bottom value=10K
R6 "Res" R0402 427.77,440.45 r270 top value=560K
R7 "Res" R0402 467.14,483.76 r270 top value=150K
R8 "Res" R0402 506.51,483.76 r270 top value=100K
R9 "Res" R0402 1968.5,343.56 r270 top value=10K
R10 "Res" R0402 598.05,110.24 r180 top value=470R
R11 "Res" R0603 528.78,1520.06 r0 top value=120R
R12 "Res" R0402 794.9,439.96 r270 top value=560K
R13 "Res" R0402 833.67,484.25 r270 top value=150K
R14 "Res" R0402 871.07,485.24 r270 top value=100K
R17 "Res" R0402 1106.08,1133.17 r0 top value=0
R18 "Res" R0402 1106.3,1096.61 r0 top value=0
R19 "Res" R0402 1185.04,1132.94 r0 top value=10K
R20 "Res" R0402 1185.04,1097.12 r0 top value=10K
R21 "Res" R0402 1229.68,1208.66 r180 top value=470
R22 "Res" R0402 1876.97,290.35 r0 top value=1M
R23 "Res" R0402 1857.05,930.11 r90 top value=100K
R24 "Res" R0402 1892.72,1355.31 r0 top value=470
R25 "Res" R0402 1927.87,1426.18 r90 top value="NO LOAD"
R26 "Res" R0402 2082.05,1085.13 r90 bottom value=1K
R27 "Res" R0402 739.17,1335.83 r270 top value=0
R28 "Res" R0402 1180.12,45.28 r90 bottom value=470R
R29 "Res" R0402 1144.68,45.28 r90 bottom value=470R
R30 "Res" R0402 1060.04,45.28 r90 bottom value=470R
R31 "Res" R0402 1025.82,45.28 r90 bottom value=470R
R32 "Res" R0402 943.21,44.3 r90 bottom value=470R
R33 "Res" R0402 947.1,744.09 r270 bottom value=470
R34 "Res" R0402 946.17,643.7 r90 bottom value=470
R35 "Res" R0402 917.32,1387.8 r90 bottom value=10K
R36 "Res" R0402 907.48,44.3 r90 bottom value=470R
R37 "Res" R0402 823.35,1437.99 r0 bottom value=0
R38 "Res" R0402 803.15,94.49 r90 bottom value=100K
R39 "Res" R0402 767.72,94.49 r90 bottom value=100K
R40 "Res" R0402 709.65,95.47 r90 bottom value=470R
R41 "Res" R0402 673.23,95.47 r90 bottom value=10K
R42 "Res" R0402 606.3,94.49 r90 bottom value=470R
R43 "Res" R0402 569.88,94.49 r90 bottom value=10K
R44 "Res" R0402 534.74,95.47 r90 bottom value=100K
R45 "Res" R0402 499.02,95 r90 bottom value=100K
R46 "Res" R0402 463.58,96.46 r90 bottom value=470R
R47 "Res" R0402 337.03,859.58 r90 bottom value=1K
R48 "Res" R0402 363.02,637.8 r90 bottom value=100K
R49 "Res" R0402 363.02,725.64 r270 bottom value=100K
R51 "Res" R0402 599.55,1335.83 r270 top value=0
R53 "Res" R0402 1048.34,804.14 r270 top value="NO LOAD"
R54 "Res" R0402 2090.55,647.89 r0 bottom value=1M
R55 "Res" R0402 279.82,52.17 r90 bottom value=470R
R56 "Res" R0402 279.69,152.39 r90 bottom value=470R
S1 "SPST Switch" PTS810 389.78,1696.03 r0 top
S2 "SPST Switch" PTS810 452.76,68.9 r0 top locked
S3 "SPST Switch" PTS810 767.72,68.9 r0 top locked
U1_I "TPD3E001" SOTFL50P160X60-5N 244.49,1359.45 r0 top (schematic designator U1)
U1_M "TPD3E001" SOTFL50P160X60-5N 244.09,847.44 r0 top (schematic designator U1)
U2 "SN74LVC2G86DCUR" DCU0008A_N 393.7,1454.72 r180 bottom
U3 "ATSAME70-144" BGA144C80P12X12_1000X1000X140 696.85,834.65 r0 top locked
U4 "TPS62135" PQFN50P200X300X100-14N 620.68,363.68 r270 top
U5 "TCAN334" SOT23-8-65P280X145-8N 668.83,1417.79 r90 top
U6 "SP330" TSOP65P640X120-24N 954.72,1375.2 r0 top
U7 "TPS62135" PQFN50P200X300X100-14N 987.81,363.19 r270 top
U8 "ATWINC3400" ATWILC3000 1503.94,446.85 r180 top locked
U9 "uINS" IS-uINS-3.2_no_paste 1305.75,1540.16 r0 top locked
U10 "Xbee SX" XBP9X-DMUS-001 1448.82,862.2 r0 bottom locked
U11 "W25QxxxJV" SOIC127P790X216-8N 683.07,1291.34 r180 bottom
U12 "MT29F" DFN800X600X65-8N 683.27,1291.14 r180 bottom
U13 "TCAN334" SOT23-8-65P280X145-8N 530.3,1417.79 r90 top
V1 "Var" R0402 199.8,279.82 r180 bottom
Y1 "Crystal" CRYMP2012X06L 450.79,674.71 r90 top value=32.768KHz
Y2 "Oscillator2" ABM10_2.5_x_2.0 588.58,1090.55 r180 top value=12MHz
Y3 "Oscillator2" SiT1533 1204.19,978.63 r0 top value=?

## Footprints (in the part's own frame and the unit in brackets; to place one, negate y for a bottom-side part, rotate by r counter-clockwise, add the part's x,y. Pads: shape width x height; smd on the part's side, far side on the other; paste and mask are expansions set on the pad)
114-00841-68 [mm] "Amphenol SD Card Socket"
  rect 0.7x1.75 smd: 1(7.7,0) 2(6.6,0) 3(5.5,0) 4(4.4,0) 5(3.3,0) 6(2.2,0) 7(1.1,0) 8(0,0)
  rect 1.5x1.75 smd: M1(10.15,0)
  rect 1.2x1.5 smd: M2(-1.25,0.125)
  rect 0.8x1.5 smd: M3(-1.45,7.725)
  rect 0.8x1.4 smd: M4(10.5,8.375)
  rect 1.45x1 smd: S1(-1.125,9.225)
  rect 1x1.55 smd: S2(10.1,10.8)
  Top keep-out region: -0.4,6.925 8.1,6.925 8.1,4.925 -0.4,4.925
  Top keep-out region: 2.55,11 5.05,11 5.05,9.1 2.55,9.1
  silkscreen extent -1.5,1.3 10.5,11.13, body extent -1.5,-4.67 10.52,11.05, height 1.65
0201 [mil]
  rect 11.8x13.8 smd: 1(-12.8,0) 2(12.8,0)
  body extent -12,-6 12,6, height 12
0402 [mm]
  rect 0.6x0.6 smd: 1(-0.55,0) 2(0.55,0)
  silkscreen extent -0.05,-0.35 0.05,0.35, body extent -0.5,-0.25 0.5,0.25, height 0.51
0603 [mm]
  rect 0.6x0.8 smd: 1(-0.7,0) 2(0.7,0)
  silkscreen extent -0.2,-0.45 0.2,0.45, body extent -0.8,-0.43 0.8,0.43, height 0.87
0805 [mm]
  rect 1.1x1.4 smd: 1(-1.1,0) 2(1.1,0)
  silkscreen extent -0.35,-0.75 0.35,0.75, body extent -1,-0.62 1,0.63, height 0.78
0806 [mm]
  rect 1.1x1.75 smd: 1(-1.1,0) 2(1.1,0)
  silkscreen extent -0.35,-0.92 0.35,0.92, body extent -1,-0.62 1,0.63, height 0.78
1206 [mm]
  rect 1.4x1.8 smd: 1(-1.6,0) 2(1.6,0)
  silkscreen extent -0.7,-0.95 0.7,0.95, body extent -1.6,-0.8 1.6,0.8, height 1
9774050151R [mm] "SMD Standoff 3.8mm dia hole, 5mm height"
  round 6 / inner round 0 / far side round 4.5 hole 3.7 paste-403.566 mask+0.102: 1(0,0)
  body extent -2.55,-2.55 2.55,2.55, height 5
ABM10_2.5_x_2.0 [mm] "Cristal, 4-Pins, Body 2.50x2.00mm"
  rect 0.9x0.8 smd: 1(-0.825,-0.625) 2(0.825,-0.625) 3(0.825,0.625) 4(-0.825,0.625)
  silkscreen extent -1.3,-1.05 0,0.1, body extent -1.3,-1.05 1.3,1.05, height 0.95
ATWILC3000 [mm] "IEEE 802.11 b/g/n 20MHz (1x1) Wi-Fi plus Bluetooth 5 Low Energy Module"
  rect 1.88x0.813 smd: 1(-7.366,5.235) 2(-7.366,4.014) 3(-7.366,2.81) 4(-7.366,1.606) 5(-7.366,0.402) 6(-7.366,-0.802) 7(-7.366,-2.006) 8(-7.366,-3.21) 9(-7.366,-4.414) 10(-7.366,-5.618) 11(-7.366,-6.822) 12(-7.366,-8.026) 13(-7.366,-9.23) 25(7.366,-9.213) 26(7.366,-8.009) 27(7.366,-6.805) 28(7.366,-5.601) 29(7.366,-4.397) 30(7.366,-3.193) 31(7.366,-1.989) 32(7.366,-0.785) 33(7.366,0.419) 34(7.366,1.623) 35(7.366,2.827) 36(7.366,4.031)
  rect 0.813x1.88 smd: 14(-6.02,-11.214) 15(-4.816,-11.214) 16(-3.612,-11.214) 17(-2.408,-11.214) 18(-1.204,-11.214) 19(0,-11.214) 20(1.204,-11.214) 21(2.408,-11.214) 22(3.612,-11.214) 23(4.816,-11.214) 24(6.02,-11.214)
  rect 4.4x4.4 smd: 37(0,0)
  silkscreen extent -8.15,-11.21 7.37,11.22, body extent -7.37,-11.21 7.37,11.21, height 2.09
BGA144C80P12X12_1000X1000X140 [mm] "BGA, 144-Leads, Body 10.00x10.00mmx1.40mm, Pitch 0.80mm"
  round 0.29 smd: A1(-4.4,4.4) A2(-3.6,4.4) A3(-2.8,4.4) A4(-2,4.4) A5(-1.2,4.4) A6(-0.4,4.4) A7(0.4,4.4) A8(1.2,4.4) A9(2,4.4) A10(2.8,4.4) A11(3.6,4.4) A12(4.4,4.4) B1(-4.4,3.6) B2(-3.6,3.6) B3(-2.8,3.6) B4(-2,3.6) B5(-1.2,3.6) B6(-0.4,3.6) B7(0.4,3.6) B8(1.2,3.6) B9(2,3.6) B10(2.8,3.6) B11(3.6,3.6) B12(4.4,3.6) C1(-4.4,2.8) C2(-3.6,2.8) C3(-2.8,2.8) C4(-2,2.8) C5(-1.2,2.8) C6(-0.4,2.8) C7(0.4,2.8) C8(1.2,2.8) C9(2,2.8) C10(2.8,2.8) C11(3.6,2.8) C12(4.4,2.8) D1(-4.4,2) D2(-3.6,2) D3(-2.8,2) D4(-2,2) D5(-1.2,2) D6(-0.4,2) D7(0.4,2) D8(1.2,2) D9(2,2) D10(2.8,2) D11(3.6,2) D12(4.4,2) E1(-4.4,1.2) E2(-3.6,1.2) E3(-2.8,1.2) E4(-2,1.2) E5(-1.2,1.2) E6(-0.4,1.2) E7(0.4,1.2) E8(1.2,1.2) E9(2,1.2) E10(2.8,1.2) E11(3.6,1.2) E12(4.4,1.2) F1(-4.4,0.4) F2(-3.6,0.4) F3(-2.8,0.4) F4(-2,0.4) F5(-1.2,0.4) F6(-0.4,0.4) F7(0.4,0.4) F8(1.2,0.4) F9(2,0.4) F10(2.8,0.4) F11(3.6,0.4) F12(4.4,0.4) G1(-4.4,-0.4) G2(-3.6,-0.4) G3(-2.8,-0.4) G4(-2,-0.4) G5(-1.2,-0.4) G6(-0.4,-0.4) G7(0.4,-0.4) G8(1.2,-0.4) G9(2,-0.4) G10(2.8,-0.4) G11(3.6,-0.4) G12(4.4,-0.4) H1(-4.4,-1.2) H2(-3.6,-1.2) H3(-2.8,-1.2) H4(-2,-1.2) H5(-1.2,-1.2) H6(-0.4,-1.2) H7(0.4,-1.2) H8(1.2,-1.2) H9(2,-1.2) H10(2.8,-1.2) H11(3.6,-1.2) H12(4.4,-1.2) J1(-4.4,-2) J2(-3.6,-2) J3(-2.8,-2) J4(-2,-2) J5(-1.2,-2) J6(-0.4,-2) J7(0.4,-2) J8(1.2,-2) J9(2,-2) J10(2.8,-2) J11(3.6,-2) J12(4.4,-2) K1(-4.4,-2.8) K2(-3.6,-2.8) K3(-2.8,-2.8) K4(-2,-2.8) K5(-1.2,-2.8) K6(-0.4,-2.8) K7(0.4,-2.8) K8(1.2,-2.8) K9(2,-2.8) K10(2.8,-2.8) K11(3.6,-2.8) K12(4.4,-2.8) L1(-4.4,-3.6) L2(-3.6,-3.6) L3(-2.8,-3.6) L4(-2,-3.6) L5(-1.2,-3.6) L6(-0.4,-3.6) L7(0.4,-3.6) L8(1.2,-3.6) L9(2,-3.6) L10(2.8,-3.6) L11(3.6,-3.6) L12(4.4,-3.6) M1(-4.4,-4.4) M2(-3.6,-4.4) M3(-2.8,-4.4) M4(-2,-4.4) M5(-1.2,-4.4) M6(-0.4,-4.4) M7(0.4,-4.4) M8(1.2,-4.4) M9(2,-4.4) M10(2.8,-4.4) M11(3.6,-4.4) M12(4.4,-4.4)
  silkscreen extent -5.77,-5 5,5, body extent -5,-5 5,5, height 1.4
CRYMP2012X06L [mm] "Molded Crystal, 2-Leads, Body 2.00x1.20mm, IPC High Density"
  rect 0.75x1.4 smd: 1(-0.725,0) 2(0.725,0)
  silkscreen extent -0.3,-0.6 0,0.6, body extent -1.05,-0.65 1.05,0.65, height 0.6
D0603B [mm] "Molded Diode, 2-Leads, Body 1.60x0.80mm, IPC Medium Density"
  rect 1.005x0.69 smd: A(0.312,0)
  rect 0.385x0.69 smd: C(-0.625,0)
  silkscreen extent -1.1,-0.35 -0.95,0.35, body extent -0.86,-0.42 0.86,0.42, height 0.45
DCU0008A_N [mm] "SOP, 8-Leads, Body 2.4x2.1mm, Pitch 0.5mm, IPC Medium Density"
  oval 0.8x0.3 smd: 1(-1.6,0.75) 2(-1.6,0.25) 3(-1.6,-0.25) 4(-1.6,-0.75) 5(1.6,-0.75) 6(1.6,-0.25) 7(1.6,0.25) 8(1.6,0.75)
  silkscreen extent -1.73,-1.05 0.8,1.57, body extent -1.56,-1 1.56,1, height 0.9
DFN800X600X65-8N [mm] "IC FLASH 2G SPI 8UPDFN"
  rect 0.84x0.42 smd: 1(-3.945,1.905) 2(-3.945,0.635) 3(-3.945,-0.635) 4(-3.945,-1.905) 5(3.945,-1.905) 6(3.945,-0.635) 7(3.945,0.635) 8(3.945,1.905)
  silkscreen extent -4.48,-3 4,3, body extent -4,-3 4,3, height 0.55
FTSH-105-01-L-DV-K-A-P [mil] "Samtec 2x5 1.27mm Header"
  rect 29x110 smd mask+2: 1(-100,-80) 2(-100,80) 3(-50,-80) 4(-50,80) 5(0,-80) 6(0,80) 7(50,-80) 8(50,80) 9(100,-80) 10(100,80)
  round 0 hole 38.98 unplated: 11(-75,0) 12(75,0)
  silkscreen extent -145,-150 145,150, body extent -125,-114 125,116, height 241
INDC2520X12N [mm] "Chip Inductor, 2-Leads, Body 2.5x2.0mm, IPC Medium Density"
  rect 1.3x2.2 smd: 1(-1.15,0) 2(1.15,0)
  silkscreen extent -0.2,-1.1 0.2,1.1, body extent -1.35,-1.1 1.35,1.1, height 1.2
IS-uINS-3.2_no_paste [mm] "Inerial Sense uINS r3.2, 22pins 1.27mm pitch"
  rect 2.05x0.8 smd paste-2.54: 1(0.225,-0.8) 2(0.225,-2.07) 3(0.225,-3.34) 4(0.225,-4.61) 5(0.225,-5.88) 6(0.225,-7.15) 7(0.225,-8.42) 8(0.225,-9.69) 9(0.225,-10.96) 10(0.225,-12.23) 11(0.225,-13.5) 12(12.275,-13.5) 13(12.275,-12.23) 14(12.275,-10.96) 15(12.275,-9.69) 16(12.275,-8.42) 17(12.275,-7.15) 18(12.275,-5.88) 19(12.275,-4.61) 20(12.275,-3.34) 21(12.275,-2.07) 22(12.275,-0.8)
  silkscreen extent -0.9,-16.05 12.5,0.7, body extent 0,-15.95 12.5,0, height 4.61
LED0404 [mm] "Multi-color 1mm x 1mm LED"
  rect 0.45x0.45 smd: 1(0.425,0.425) 2(0.425,-0.425) 3(-0.425,-0.425) 4(-0.425,0.425)
  silkscreen extent 0,0 0.6,0.6, body extent -0.5,-0.5 0.5,0.5, height 0.19
ML614S [mm] "3.3V Coin Cell Battery"
  rect 1.1x2.4 smd: +(1,0) -(-1,0)
  silkscreen extent -3.37,1.33 3.46,8.81, body extent -3.44,1.99 3.38,8.81, height 1.45
PQFN50P200X300X100-14N [mm] "PQFN, 14-Leads, Body 2.00x3.00mm, Pitch 0.50mm, IPC Medium Density"
  rrect50% 2.5x0.35 smd paste-5 mask-0.05: 1(0,0.5) 2(0,0) 3(0,-0.5)
  rrect50% 0.25x0.6 smd mask+0.05: 4(-0.75,-1.4) 5(-0.25,-1.4) 6(0.25,-1.4) 7(0.75,-1.4) 8(0.75,1.4) 9(0.25,1.4) 10(-0.25,1.4) 11(-0.75,1.4)
  rrect50% 0.66x0.25 on Top Paste paste-5 mask+0: ""(-0.87,0.5) ""(-0.87,0) ""(-0.87,-0.5) ""(0,0.5) ""(0,0) ""(0,-0.5) ""(0.87,0.5) ""(0.87,0) ""(0.87,-0.5)
  silkscreen extent -1.62,1.88 -1.38,2.13, body extent -1.05,-1.55 1.05,1.55, height 1
PTS810 [mm] "SWITCH TACTILE SPST-NO 0.05A 32V"
  rect 1.05x0.65 smd: 1(-2.075,1.075) 1(2.075,1.075) 2(-2.075,-1.075) 2(2.075,-1.075)
  silkscreen extent -1.2,-1.6 1.2,1.6, body extent -2.29,-1.6 2.29,1.6, height 2.5
R0402 [mm]
  rect 0.6x0.6 smd: 1(-0.55,0) 2(0.55,0)
  silkscreen extent -0.05,-0.36 0.05,0.34, body extent -0.5,-0.3 0.5,0.3, height 0.2
R0603 [mm]
  rect 0.6x0.8 smd: 1(-0.7,0) 2(0.7,0)
  silkscreen extent -0.2,-0.45 0.2,0.45, body extent -0.8,-0.4 0.8,0.4, height 0.3
"RF RPSMA End Launch" [mm] "RF RPSMA End Launch Jack"
  rect 1.5x5.2 smd: 1(0,-3.1)
  rect 1.5x4.9 smd: 2(-4.25,-3.25) 3(4.25,-3.25)
  rect 1.5x4.9 smd far side: 4(-4.25,-3.25) 5(4.25,-3.25)
  Top pour cut-out: -0.95,-0.5 -0.95,0 0.95,0 0.95,-0.5
  silkscreen extent -3.1,-4.8 3.1,-4.8, body extent -4.75,-4.77 4.77,9.78, height 4.34
"RF SMA End Launch 2" [mm] "RF SMA End Launch Jack"
  rect 1.5x5.2 smd: 1(0,-3.1)
  rect 1.5x4.9 smd: 2(-4.25,-3.25) 3(4.25,-3.25)
  rect 1.5x4.9 smd far side: 4(-4.25,-3.25) 5(4.25,-3.25)
  Top pour cut-out: -0.95,-0.5 -0.95,0 0.95,0 0.95,-0.5
  silkscreen extent -3.1,-4.8 3.1,-4.8, body extent -4.75,-4.74 4.77,9.54, height 4.34
"RF UMC SMD" [mm] "Ultra Miniature Coaxial Surface Mount"
  rect 1.05x1 smd: 1(1.525,0)
  rect 2.2x1.05 smd: 2(0,-1.475) 3(0,1.475)
  Top pour cut-out: -1.05,0.95 -1.05,-0.95 0.9,-0.95 0.9,0.95
  Top keep-out region: -0.85,0.7 -0.85,-0.7 0.75,-0.7 0.75,0.7
  silkscreen extent 1.4,-1.5 1.4,1.5, body extent -1.55,-1.5 1.55,1.5, height 1.3
S2B-PH-SM4-TB(LF)(SN) [mm]
  rect 1.5x3.4 smd: 0(-2.85,1.5) 0(2.85,1.5)
  rect 1x3.5 smd: 1(-1,7.25) 2(1,7.25)
  silkscreen extent -3.93,0 3.95,7.63, body extent -3.95,0 3.95,8.6, height 5.6
SiT1533 [mm] "DFN, 2-Leads, Body 1.20x2.00mm, Pitch 1.50mm, IPC Medium Density"
  rect 0.4x1.4 smd: 1(-0.8,0) 3(0.8,0)
  rect 0.3x0.5 smd: 2(-0.1,-0.45) 4(0.1,0.45)
  silkscreen extent -1.3,-0.7 0.4,0, body extent -1.02,-0.63 1.03,0.63, height 0.6
SM04B-GHS-TB(LF)(SN) [mm] "CONN HEADER GH TOP 4POS 1.25MM"
  rect 1x2.7 smd: 0(-3.1,1.35) 0(4.35,1.35)
  rect 0.6x1.7 smd: 1(-1.25,4.55) 2(0,4.55) 3(1.25,4.55) 4(2.5,4.55)
  silkscreen extent -3.5,0.35 4.75,5.75, body extent -3.5,0.35 4.75,5.2, height 4.35
SM05B-GHS-TB(LF)(SN) [mm] "CONN HEADER GH TOP 15POS 1.25MM"
  rect 1x2.7 smd: 0(-4.35,1.35) 0(4.35,1.35)
  rect 0.6x1.7 smd: 1(-2.5,4.55) 2(-1.25,4.55) 3(0,4.55) 4(1.25,4.55) 5(2.5,4.55)
  silkscreen extent -4.75,0.35 4.75,5.75, body extent -4.75,0.35 4.75,5.2, height 4.35
SM09B-GHS-TB(LF)(SN) [mm] "CONN HEADER GH TOP 9POS 1.25MM"
  rect 1x2.7 smd: 0(-4.975,1.35) 0(8.725,1.35)
  rect 0.6x1.7 smd: 1(-3.125,4.55) 2(-1.875,4.55) 3(-0.625,4.55) 4(0.625,4.55) 5(1.875,4.55) 6(3.125,4.55) 7(4.375,4.55) 8(5.625,4.55) 9(6.875,4.55)
  silkscreen extent -5.38,0.35 9.2,5.75, body extent -5.38,0.35 9.13,5.2, height 4.35
SM14B-GHS-TB(LF)(SN) [mm] "CONN HEADER GH TOP 15POS 1.25MM"
  rect 1x2.7 smd: 0(-9.975,1.35) 0(9.975,1.35)
  rect 0.6x1.7 smd: 1(-8.125,4.55) 2(-6.875,4.55) 3(-5.625,4.55) 4(-4.375,4.55) 5(-3.125,4.55) 6(-1.875,4.55) 7(-0.625,4.55) 8(0.625,4.55) 9(1.875,4.55) 10(3.125,4.55) 11(4.375,4.55) 12(5.625,4.55) 13(6.875,4.55) 14(8.125,4.55)
  silkscreen extent -10.38,0.35 10.38,5.75, body extent -10.38,0.35 10.37,5.2, height 4.35
SOIC127P790X216-8N [mm] "SOIC, 8-Leads, Body 5.28x5.28mm, Pitch 1.27mm, IPC Medium Density"
  rect 1.7x0.6 smd: 1(-3.55,1.905) 2(-3.55,0.635) 3(-3.55,-0.635) 4(-3.55,-1.905) 5(3.55,-1.905) 6(3.55,-0.635) 7(3.55,0.635) 8(3.55,1.905)
  silkscreen extent -3.68,-2.7 2.3,2.88, body extent -3.95,-2.7 3.95,2.7, height 2.16
SOT23-8-65P280X145-8N [mm] "SOT23, 8-Leads, Body 2.90x1.63mm, Pitch 0.65mm, IPC Medium Density"
  rect 1.1x0.45 smd: 1(-1.3,0.975) 2(-1.3,0.325) 3(-1.3,-0.325) 4(-1.3,-0.975) 5(1.3,-0.975) 6(1.3,-0.325) 7(1.3,0.325) 8(1.3,0.975)
  silkscreen extent -1.3,-1.5 0.5,1.86, body extent -1.4,-1.5 1.4,1.5, height 1.11
SOTFL50P160X60-5N [mm] "SOTFL, 5-Leads, Body 1.60x1.60mm, Pitch 0.50mm, IPC Medium Density"
  rect 0.5x0.3 smd: 1(-0.675,0.5) 2(-0.675,0) 3(-0.675,-0.5) 4(0.675,-0.5) 5(0.675,0.5)
  silkscreen extent -0.8,-0.85 0.1,1.32, body extent -0.65,-0.85 0.65,0.85, height 0.6
TSOP65P640X120-24N [mm] "TSOP, 24-Leads, Body 7.80x4.40mm, Pitch 0.65mm, IPC Medium Density"
  rect 1.4x0.45 smd: 1(-2.95,3.575) 2(-2.95,2.925) 3(-2.95,2.275) 4(-2.95,1.625) 5(-2.95,0.975) 6(-2.95,0.325) 7(-2.95,-0.325) 8(-2.95,-0.975) 9(-2.95,-1.625) 10(-2.95,-2.275) 11(-2.95,-2.925) 12(-2.95,-3.575) 13(2.95,-3.575) 14(2.95,-2.925) 15(2.95,-2.275) 16(2.95,-1.625) 17(2.95,-0.975) 18(2.95,-0.325) 19(2.95,0.325) 20(2.95,0.975) 21(2.95,1.625) 22(2.95,2.275) 23(2.95,2.925) 24(2.95,3.575)
  silkscreen extent -3.07,-3.95 1.85,4.47, body extent -3.2,-3.95 3.2,3.95, height 1.2
TSST8 [mm] "TSST, 8-Leads, Body 3.03x1.63mm, Pitch 0.65mm, IPC Medium Density"
  rect 0.66x0.457 smd: D1(0.686,0.325) D1(0.686,0.975) D2(0.686,-0.975) D2(0.686,-0.325) G1(-0.686,0.325) G2(-0.686,-0.975) S1(-0.686,0.975) S2(-0.686,-0.325)
  silkscreen extent -0.81,-1.55 0.1,1.88, body extent -0.85,-1.55 0.85,1.55, height 1.1
"USB Micro AB R/A THR - design" [mm] "USB Micro AB R/A Through Hole"
  rect 0.4x1.35 smd: 1(-1.3,2.7) 2(-0.65,2.7) 3(0,2.7) 4(0.65,2.7) 5(1.3,2.7)
  rrect90% 1.2x1.9 hole 0.5 slot 1.3 at 90 deg: 6(-3.5,0) 7(3.5,0)
  rect 1.2x1.9 smd: 6(-2.9,0) 7(2.9,0)
  round 1.45 hole 0.85 mask+0.102: 6(-2.5,2.7) 7(2.5,2.7)
  rect 1.5x1.9 smd: 8(-1,0) 9(1,0)
  silkscreen extent -3.9,-1.45 3.9,3, body extent -6,-28.56 6,2.92, height 5.28
XBP9X-DMUS-001 [mm] "XBEE PRO MOD TXRX ISM 915MHZ UFL"
  rect 2.84x1.52 smd: 1(-10.744,9) 2(-10.744,7) 3(-10.744,5) 4(-10.744,3) 5(-10.744,1) 6(-10.744,-1) 7(-10.744,-3) 8(-10.744,-5) 9(-10.744,-7) 10(-10.744,-9) 11(-10.744,-11) 12(-10.744,-13) 13(-10.744,-15) 22(10.744,-15) 23(10.744,-13) 24(10.744,-11) 25(10.744,-9) 26(10.744,-7) 27(10.744,-5) 28(10.744,-3) 29(10.744,-1) 30(10.744,1) 31(10.744,3) 32(10.744,5) 33(10.744,7) 34(10.744,9) 35(10.744,11) 36(10.744,13) 37(10.744,15)
  rect 2.79x2.79 smd: 38(-4.8,6.23)
  Top keep-out region: 2.9,10.5 9.1,10.5 9.1,6.9 2.9,6.9
  silkscreen extent -12.15,-17.04 11.15,17.04, body extent -11,-16.89 11,16.89, height 2.5

## Part data
BAT1: "BATTERY LITH 3V RECHARGE SMD", Capacity=3mAh, Manufacturer=Seiko, Manufacturer Part Number=MS621T-FL11E, Supplier Part Number 1=728-1080-ND, Voltage Rating=3V, ComponentLink2Description=https://www.sii.co.jp/en/me/files/2018/04/MicroBattery_catalogue_E_2018_forWeb.pdf?src-supplier=Digi-Key, ComponentLink2URL=https://www.sii.co.jp/en/me/files/2018/04/MicroBattery_catalogue_E_2018_forWeb.pdf?src-supplier=Digi-Key, Height=0.08inch, Pricing 1="1=2.60000, 10=2.15200, 50=1.89740, 100=1.79140, 300=1.66420, 500=1.57940, 1000=1.49460, 2500=1.42040 (USD)", RoHS=Yes, Stock 1=1968, Supplier 1=Digi-Key, Termination=SMD/SMT, Weight=0.23g
C1 C12 C20 C29 C52 C54 C55 C56: "CAP CER 10UF 35V X5R 0805", Capacitance=10uF, Case/Package=0805, Case Code (Metric)=2012, Dielectric=X5R, Dielectric Material=Ceramic, Manufacturer=TDK, Manufacturer Part Number=C2012X5R1V106K085AC, Max Operating Temperature=85°C, Min Operating Temperature=-55°C, Package Quantity=1, Supplier Part Number 1=445-14417-6-ND, Tolerance=10%, Voltage Rating=35V, Case Code (Imperial)=0805, Category=Capacitors, ComponentLink1Description=https://datasheet.ciiva.com/14894/tdkmlcccaprange-14894527.pdf, ComponentLink1URL=https://datasheet.ciiva.com/14894/tdkmlcccaprange-14894527.pdf, Height=0.85mm, LatestRevisionDate=17-Jul-2002, LatestRevisionNote="Re-released for DXP Platform.", Lead Free="Lead Free", Length=0.079inch, Mount="Surface Mount", Packaging="Tape and Reel", Pricing 1="1=0.83, 10=0.589, 100=0.3881, 500=0.2875, 1000=0.24438 (USD)", Published=8-Jun-2000, Publisher="Altium Limited", REACH SVHC="No SVHC", Stock 1=0, Supplier 1=Digi-Key, Termination=SMD/SMT, Thickness=0.039inch, Voltage Rating (DC)=35V, Weight=0.000194oz, Width=0.049inch
C2_I C2_M C5 C9 C13 C14 C16 C22 C23 C24 C25 C26 C27 C28 C30 C32 C41 C51 C57: "CAP CER .10UF 50V X7R 10% 0402", Capacitance=0.1µF, Manufacturer="TDK Corporation", Manufacturer Part Number=C1005X7R1H104K, Operating Temperature="-55°C ~ 125°C", Package / Case="0402 (1005 Metric)", Ratings=-, Supplier Part Number 1=445-5932-1-ND, Temperature Coefficient=X7R, Tolerance=±10%, Voltage - Rated=50V, Applications="General Purpose", Category=Capacitors, ComponentLink1Description=http://www.tdk.co.jp/tefe02/e412_c.pdf, ComponentLink1URL=http://www.tdk.co.jp/tefe02/e412_c.pdf, Features=-, Height=-, LatestRevisionDate=17-Jul-2002, LatestRevisionNote="Re-released for DXP Platform.", Lead Spacing=-, Lead Style=-, Mounting Type="Surface Mount, MLCC", Packaging="Cut Tape (CT)", Pricing 1="1=0.3, 10=0.2, 100=0.08, 250=0.05752, 500=0.041, 1000=0.03 (USD)", Published=8-Jun-2000, Publisher="Altium Limited", RoHS="RoHS Compliant", Size / Dimension="0.039\" L x 0.020\" W (1.00mm x 0.50mm)", Stock 1=174080, Supplier 1=Digi-Key, Thickness="0.022\" (0.55mm)"
C3: "CAP CER 0.22UF 16V X7R 0402", Capacitance=220nF, Case/Package=0402, Case Code (Metric)=1005, Dielectric=X7R, Manufacturer=Murata, Manufacturer Part Number=GRM155R71C224KA12D, Max Operating Temperature=125°C, Min Operating Temperature=-55°C, Package Quantity=1, Supplier Part Number 1=490-5418-6-ND, Tolerance=10%, Voltage=16V, Case Code (Imperial)=0402, Category=Capacitors, ComponentLink1Description=https://datasheet.ciiva.com/132/product-132672.pdf, ComponentLink1URL=https://datasheet.ciiva.com/132/product-132672.pdf, ComponentLink2Description=https://datasheet.ciiva.com/18184/getdatasheetpartid-347270-18184668.pdf, ComponentLink2URL=https://datasheet.ciiva.com/18184/getdatasheetpartid-347270-18184668.pdf, ComponentLink3Description=https://datasheet.ciiva.com/29199/454127-da-01-en-vs-kondensator-0402-29199807.pdf, ComponentLink3URL=https://datasheet.ciiva.com/29199/454127-da-01-en-vs-kondensator-0402-29199807.pdf, ComponentLink4Description=https://datasheet.ciiva.com/16624/product-16624533.pdf, ComponentLink4URL=https://datasheet.ciiva.com/16624/product-16624533.pdf, ComponentLink5Description=https://datasheet.ciiva.com/16467/product-16467307.pdf, ComponentLink5URL=https://datasheet.ciiva.com/16467/product-16467307.pdf, ComponentLink6Description=https://datasheet.ciiva.com/48671/product-48671325.pdf, ComponentLink6URL=https://datasheet.ciiva.com/48671/product-48671325.pdf, ComponentLink7Description=https://datasheet.ciiva.com/132/partnumbering-e-01-132670.pdf, ComponentLink7URL=https://datasheet.ciiva.com/132/partnumbering-e-01-132670.pdf, ComponentLink8Description=https://datasheet.ciiva.com/132/partnumbering-e-01-132671.pdf, ComponentLink8URL=https://datasheet.ciiva.com/132/partnumbering-e-01-132671.pdf, Depth=0.5mm, Height=0.5mm, LatestRevisionDate=17-Jul-2002, LatestRevisionNote="Re-released for DXP Platform.", Lead Free="Lead Free", Length=1mm, Material=Ceramic, Mount="Surface Mount", Packaging="Tape and Reel", Pricing 1="1=0.15, 10=0.105, 100=0.0494, 500=0.03466, 1000=0.02869, 2500=0.0267, 5000=0.02443 (USD)", Published=8-Jun-2000, Publisher="Altium Limited", Radiation Hardening=No, REACH SVHC="No SVHC", Stock 1=0, Supplier 1=Digi-Key, Termination=SMD/SMT, Thickness=0.022inch, Voltage Rating=16V, Voltage Rating (DC)=16V, Width=0.02inch
C4: "CAP CER 10PF 50V C0G 0402", Capacitance=10pF, Case/Package=0402, Case Code (Metric)=1005, Dielectric=C0G, Dielectric Material=Ceramic, Manufacturer=TDK, Manufacturer Part Number=C1005C0G1H100D050BA, Max Operating Temperature=125°C, Min Operating Temperature=-55°C, Package Quantity=1, Supplier Part Number 1=445-1235-6-ND, Temperature Coefficient=30ppm/°C, Voltage=50V, Case Code (Imperial)=0402, Category=Capacitors, Depth=0.5mm, Height=0.5mm, LatestRevisionDate=17-Jul-2002, LatestRevisionNote="Re-released for DXP Platform.", Lead Free="Lead Free", Length=1mm, Mount="Surface Mount", Number of Pins=2, Packaging="Tape and Reel", Pricing 1="1=0.1, 10=0.027, 100=0.012, 500=0.00858, 1000=0.00674, 2500=0.00612, 5000=0.00564 (USD)", Published=8-Jun-2000, Publisher="Altium Limited", Radiation Hardening=No, REACH SVHC="No SVHC", Stock 1=0, Supplier 1=Digi-Key, Termination=SMD/SMT, Thickness=0.022inch, Voltage Rating=50V, Voltage Rating (DC)=50V, Weight=2.3E-05oz, Width=0.02inch
C6 C7: "CAP CER 15PF 16V C0G/NP0 0402", Capacitance=15pF, Case/Package=0402, Case Code (Metric)=1005, Dielectric=C0G, Dielectric Material=Ceramic, Manufacturer=KEMET, Manufacturer Part Number=C0402C150J4GACTU, Max Operating Temperature=125°C, Min Operating Temperature=-55°C, Package Quantity=1, Supplier Part Number 1=399-8947-6-ND, Tolerance=5%, Voltage Rating=16V, Case Code (Imperial)=0402, Category=Capacitors, Depth=0.5mm, Dissipation Factor=0.1%, Height=0.5mm, LatestRevisionDate=17-Jul-2002, LatestRevisionNote="Re-released for DXP Platform.", Lead Free="Lead Free", Lead Pitch=0.3mm, Length=1mm, Mount="Surface Mount", Packaging="Tape and Reel", Pricing 1="1=0.1, 10=0.028, 100=0.0127, 500=0.00906, 1000=0.00712, 2500=0.00647, 5000=0.00595 (USD)", Published=8-Jun-2000, Publisher="Altium Limited", REACH SVHC="No SVHC", Stock 1=94634, Supplier 1=Digi-Key, Termination=SMD/SMT, Thickness=0.022inch, Voltage Rating (DC)=16V, Width=0.02inch
C8 C11 C19 C36 C37 C38 C39 C40 C42 C43 C44 C45 C46 C47 C48 C49 C50: "CAP CER 0.1UF 25V X5R 0201", Capacitance=100nF, Case/Package=0201, Case Code (Metric)=0603, Dielectric=X5R, Manufacturer=Murata, Manufacturer Part Number=GRM033R6YA104KE14D, Max Operating Temperature=85°C, Min Operating Temperature=-55°C, Package Quantity=15000, Supplier Part Number 1=490-10430-1-ND, Tolerance=10%, Voltage Rating=35V, Case Code (Imperial)=0201, Category=Capacitors, Height=0.3mm, LatestRevisionDate=17-Jul-2002, LatestRevisionNote="Re-released for DXP Platform.", Length=0.024inch, Mount="Surface Mount", Packaging="Tape and Reel", Pricing 1="1=0.1, 10=0.066, 100=0.0296, 500=0.02114, 1000=0.0166, 2500=0.01509, 5000=0.01389 (USD)", Published=8-Jun-2000, Publisher="Altium Limited", Stock 1=150000, Supplier 1=Digi-Key, Termination=SMD/SMT, Thickness=0.013inch, Voltage Rating (DC)=35V, Weight=1.2E-05oz, Width=0.3mm
C10 C18 C33: "CAP CER 22UF 10V X5R 1206", Capacitance=22uF, Case/Package=1206, Case Code (Metric)=3216, Dielectric=X5R, Manufacturer=Samsung, Manufacturer Part Number=CL31A226KPHNNNE, Max Operating Temperature=85°C, Min Operating Temperature=-55°C, Package Quantity=1, Supplier Part Number 1=1276-1287-6-ND, Tolerance=10%, Voltage Rating=10V, Case Code (Imperial)=1206, ComponentLink1Description=http://www.murata.com/~/media/webrenewal/products/inductor/chip/tokoproducts/wirewoundmetalalloychiptype/m_dfe252012f.ashx, ComponentLink1URL=http://www.murata.com/~/media/webrenewal/products/inductor/chip/tokoproducts/wirewoundmetalalloychiptype/m_dfe252012f.ashx, ComponentLink2Description=https://www.murata.com/~/media/webrenewal/products/inductor/chip/tokoproducts/wirewoundmetalalloychiptype/m_dfe252012f.ashx, ComponentLink2URL=https://www.murata.com/~/media/webrenewal/products/inductor/chip/tokoproducts/wirewoundmetalalloychiptype/m_dfe252012f.ashx, ComponentLink3Description=https://datasheet.ciiva.com/15196/getdatasheetpartid-355211-15196000.pdf, ComponentLink3URL=https://datasheet.ciiva.com/15196/getdatasheetpartid-355211-15196000.pdf, ComponentLink4Description=https://datasheet.ciiva.com/16437/cl05b104kq5nnnc-16437214.pdf, ComponentLink4URL=https://datasheet.ciiva.com/16437/cl05b104kq5nnnc-16437214.pdf, Depth=1.6mm, Height=1.6mm, Lead Free="Lead Free", Length=3.2mm, Mount="Surface Mount", Packaging="Tape and Reel", Pricing 1="1=0.42, 10=0.289, 100=0.1638, 500=0.1156, 1000=0.10114 (USD)", Radiation Hardening=No, Stock 1=46, Supplier 1=Digi-Key, Thickness=0.071inch, Voltage Rating (DC)=10V, Width=0.063inch
C15 C21: "CAP CER 0.0033UF 50V X7R 0402", Capacitance=3.3nF, Case/Package=0402, Case Code (Metric)=1005, Dielectric=X7R, Manufacturer=Samsung, Manufacturer Part Number=CL05B332JB5NNNC, Max Operating Temperature=125°C, Min Operating Temperature=-55°C, Package Quantity=1, Supplier Part Number 1=1276-1548-6-ND, Tolerance=5%, Voltage Rating=50V, Case Code (Imperial)=0402, ComponentLink1Description=https://datasheet.ciiva.com/25737/cl05b333ka5nnnc-25737430.pdf, ComponentLink1URL=https://datasheet.ciiva.com/25737/cl05b333ka5nnnc-25737430.pdf, ComponentLink2Description=http://www.samsungsem.com/kr/support/product-search/mlcc/CL05B332JB5NNNC.jsp, ComponentLink2URL=http://www.samsungsem.com/kr/support/product-search/mlcc/CL05B332JB5NNNC.jsp, Depth=0.5mm, Height=0.5mm, Length=1mm, Mount="Surface Mount", Packaging="Tape and Reel", Pricing 1="1=0.1, 10=0.064, 100=0.0285, 500=0.02034, 1000=0.01598, 2500=0.01453, 5000=0.01337 (USD)", Radiation Hardening=No, Stock 1=99431, Supplier 1=Digi-Key, Thickness=0.022inch, Voltage Rating (DC)=50V, Width=0.02inch
C17 C31: "CAP CER 1UF 25V X7R 0603", Capacitance=1uF, Case/Package=0603, Case Code (Metric)=1608, Dielectric=X7R, Manufacturer=Samsung, Manufacturer Part Number=CL10B105KA8NNNC, Max Operating Temperature=125°C, Min Operating Temperature=-55°C, Package Quantity=1, Supplier Part Number 1=1276-1184-6-ND, Tolerance=10%, Voltage=25V, Case Code (Imperial)=0603, Category=Capacitors, ComponentLink1Description=https://datasheet.ciiva.com/16449/cl10b105ka8nnnc-16449544.pdf, ComponentLink1URL=https://datasheet.ciiva.com/16449/cl10b105ka8nnnc-16449544.pdf, ComponentLink2Description=https://datasheet.ciiva.com/15195/getdatasheetpartid-359554-15195726.pdf, ComponentLink2URL=https://datasheet.ciiva.com/15195/getdatasheetpartid-359554-15195726.pdf, Contact Plating=Tin, Depth=0.8mm, Height=0.8mm, LatestRevisionDate=17-Jul-2002, LatestRevisionNote="Re-released for DXP Platform.", Length=1.6mm, Mount="Surface Mount", Packaging="Tape and Reel", Pricing 1="1=0.1, 10=0.069, 100=0.0306, 500=0.02188, 1000=0.01719 (USD)", Published=8-Jun-2000, Publisher="Altium Limited", Radiation Hardening=No, Stock 1=0, Supplier 1=Digi-Key, Thickness=0.035inch, Voltage Rating=25V, Width=0.031inch
C34: "CAP CER 0.047UF 16V Y5V 0402", Capacitance=47nF, Case/Package=0402, Case Code (Metric)=1005, Dielectric=Y5V, Dielectric Material=Ceramic, Insulation Resistance=100GR, Manufacturer=Yageo, Manufacturer Part Number=CC0402ZRY5V7BB473, Max Operating Temperature=85°C, Min Operating Temperature=-30°C, Package Quantity=10000, Supplier Part Number 1=311-1046-6-ND, Tolerance=80%, Voltage Rating=16V, Case Code (Imperial)=0402, Category=Capacitors, Composition=Ceramic, Depth=0.5mm, Halogen Free="Halogen Free", Height=0.5mm, LatestRevisionDate=17-Jul-2002, LatestRevisionNote="Re-released for DXP Platform.", Lead Free="Lead Free", Length=1mm, Mount="Surface Mount", Number of Pins=2, Packaging="Tape and Reel", Pricing 1="1=0.1, 10=0.037, 100=0.0165, 500=0.01178, 1000=0.00926, 2500=0.00842, 5000=0.00774 (USD)", Published=8-Jun-2000, Publisher="Altium Limited", Radiation Hardening=No, REACH SVHC="No SVHC", Stock 1=0, Supplier 1=Digi-Key, Termination=SMD/SMT, Thickness=0.022inch, Voltage Rating (DC)=16V, Width=0.02inch
C35 C53: "CAP CER 2.2UF 6.3V X5R 0603", Capacitance=2.2uF, Case/Package=0603, Case Code (Metric)=1608, Manufacturer=Samsung, Manufacturer Part Number=CL10A225KQ8NNWC, Max Operating Temperature=85°C, Min Operating Temperature=-55°C, Package Quantity=4000, Supplier Part Number 1=1276-1886-1-ND, Tolerance=10%, Voltage Rating=6.3V, Case Code (Imperial)=0603, ComponentLink1Description=https://datasheet.ciiva.com/25798/cl21b225kafnfne-25798721.pdf, ComponentLink1URL=https://datasheet.ciiva.com/25798/cl21b225kafnfne-25798721.pdf, Length=0.063inch, Mount="Surface Mount", Packaging="Cut Tape", Pricing 1="1=0.13, 10=0.096, 100=0.0429, 500=0.03062, 1000=0.02406 (USD)", Stock 1=40000, Supplier 1=Digi-Key, Thickness=0.035inch, Width=0.031inch
D1 D2 D3 D4 D5: "LED RGB DIFFUSED 0404 SMD", Color="Red, Green, Blue (RGB)", Current - Test="5mA Red, 5mA Green, 5mA Blue", Lens Color=White, Manufacturer="Rohm Semiconductor", Manufacturer Part Number=SMLP34RGB2W3, Millicandela Rating="35mcd Red, 110mcd Green, 45mcd Blue", Package / Case="0404 (1010 Metric)", Supplier Device Package=PICOLED, Supplier Part Number 1=SMLP34RGB2W3TR-ND, Voltage - Forward (Vf) (Typ)="2.1V Red, 3.1V Green, 3V Blue", Category=Optoelectronics, ComponentLink1Description=http://rohmfs.rohm.com/en/products/databook/datasheet/opto/led/chip_multi/smlp34.pdf, ComponentLink1URL=http://rohmfs.rohm.com/en/products/databook/datasheet/opto/led/chip_multi/smlp34.pdf, Features=-, Height (Max)=0.25mm, LatestRevisionDate=08-Jul-2005, LatestRevisionNote="Mech Layer 1 removed.", Lens Style/Size="Rectangle with Flat Top, 1.00mm x 0.60mm", Lens Transparency=Diffused, Mounting Type="Surface Mount", PackageReference=LED-0, Packaging="Tape & Reel (TR)", Pricing 1="5000=0.297, 10000=0.2926, 25000=0.286, 50000=0.275, 125000=0.264 (USD)", Published=8-Jun-2000, Publisher="Altium Limited", RoHS="RoHS Compliant", Size / Dimension="1.00mm L x 1.00mm W", Stock 1=55000, Supplier 1=Digi-Key, Viewing Angle=-, Wavelength - Dominant="624nm Red, 527nm Green, 470nm Blue", Wavelength - Peak=-
D6 D7: "DIODE SCHOTTKY 30V 2A 0603", Manufacturer=Vishay, Manufacturer Part Number=VSKY20301608-G4-08, Supplier Part Number 1=VSKY20301608-G4-08GICT-ND, ComponentLink1Description=http://www.mouser.com/ds/2/427/vsky20301608-777242.pdf, ComponentLink1URL=http://www.mouser.com/ds/2/427/vsky20301608-777242.pdf, Pricing 1="1=0.38, 10=0.305, 25=0.2792, 100=0.2076, 250=0.1882, 500=0.15574, 1000=0.1168, 2500=0.10707 (USD)", Stock 1=13064, Supplier 1=Digi-Key
H1: "CONN HEADER PH SIDE 2POS 2MM SMD", Colour=Natural,White, Contact Resistance=20mR, Current Rating=2A, Flammability Rating="UL94 V-0", Housing Colour=Beige, Insulation Resistance=1GR, Manufacturer=JST, Manufacturer Part Number=S2B-PH-SM4-TB(LF)(SN), Max Operating Temperature=85°C, Max Voltage Rating (AC)=100V, Min Operating Temperature=-25°C, Supplier Part Number 1=455-1749-1-ND, Connector Type="Male Pin", Contact Material="Brass,Bronze,Copper Alloy,Tin", Contact Mating Length=0.13inch, Contact Plating=Copper,Tin, Depth=7.6mm, Fastening Type=Detent, Gender=Male, Height=9.4mm, Housing Material=Polyamide, Lead Free="Lead Free", Lead Pitch=2mm, Length=7.9mm, Max Current Rating=2A, Max Voltage Rating (DC)=100V, Mount="Surface Mount", Number of Contacts=2, Number of Poles=2, Number of Positions=2, Number of Rows=1, Orientation="Right Angle", Packaging="Tape and Reel", Pitch=2mm, Pricing 1="1=0.58, 10=0.547, 100=0.4194, 500=0.3647 (USD)", REACH SVHC="No SVHC", Stock 1=160048, Supplier 1=Digi-Key, Termination=Solder, Voltage Rating=100V, Voltage Rating (AC)=100V, Width=5mm, Working Voltage=100V
H2: "CONN HEADER GH SIDE 4POS 1.25MM", Colour=Natural, Manufacturer=JST, Manufacturer Part Number=SM04B-GHS-TB(LF)(SN)-, Supplier Part Number 1=455-1566-1-ND, Connector Type="Outer Shroud Contact", Contact Plating=Tin, Fastening Type=Ramp, Mount="Surface Mount", Number of Positions=4, Number of Rows=1, Packaging="Cut Tape", Pitch=0.049inch, Pricing 1="1=0.45, 10=0.423, 100=0.3244, 500=0.28212, 1000=0.23274 (USD)", Stock 1=1762, Supplier 1=Digi-Key, Termination=Solder
H3: "CONN HEADER GH SIDE 5POS 1.25MM", Colour=Natural, Current Rating=1A, Manufacturer=JST, Manufacturer Part Number=SM05B-GHS-TB(LF)(SN), Max Operating Temperature=85°C, Min Operating Temperature=-25°C, Supplier Part Number 1=455-1567-1-ND, Voltage Rating=50V, Connector Type="Outer Shroud Contact", Contact Material=Bronze, Contact Plating=Tin, Fastening Type=Ramp, Housing Colour=Natural, Housing Material=Nylon, Lead Free="Lead Free", Mount="Surface Mount", Number of Contacts=5, Number of Positions=5, Number of Rows=1, Orientation="Right Angle", Packaging="Tape and Reel", Pitch=0.049inch, REACH SVHC="No SVHC", Stock 1=0, Supplier 1=Digi-Key, Termination=Solder, Voltage Rating (AC)=50V, Wire/Cable Gauge=26AWG